# EAGLE board MeadowF7MicroDebug_REVB (EAGLE 9.2.2), part 1 of 2
uMeadow eval Kit.
DATE: 09/16/2018; ENGINEER: S.JOHNSON; PART_NUMBER: uMeadow; REV: A
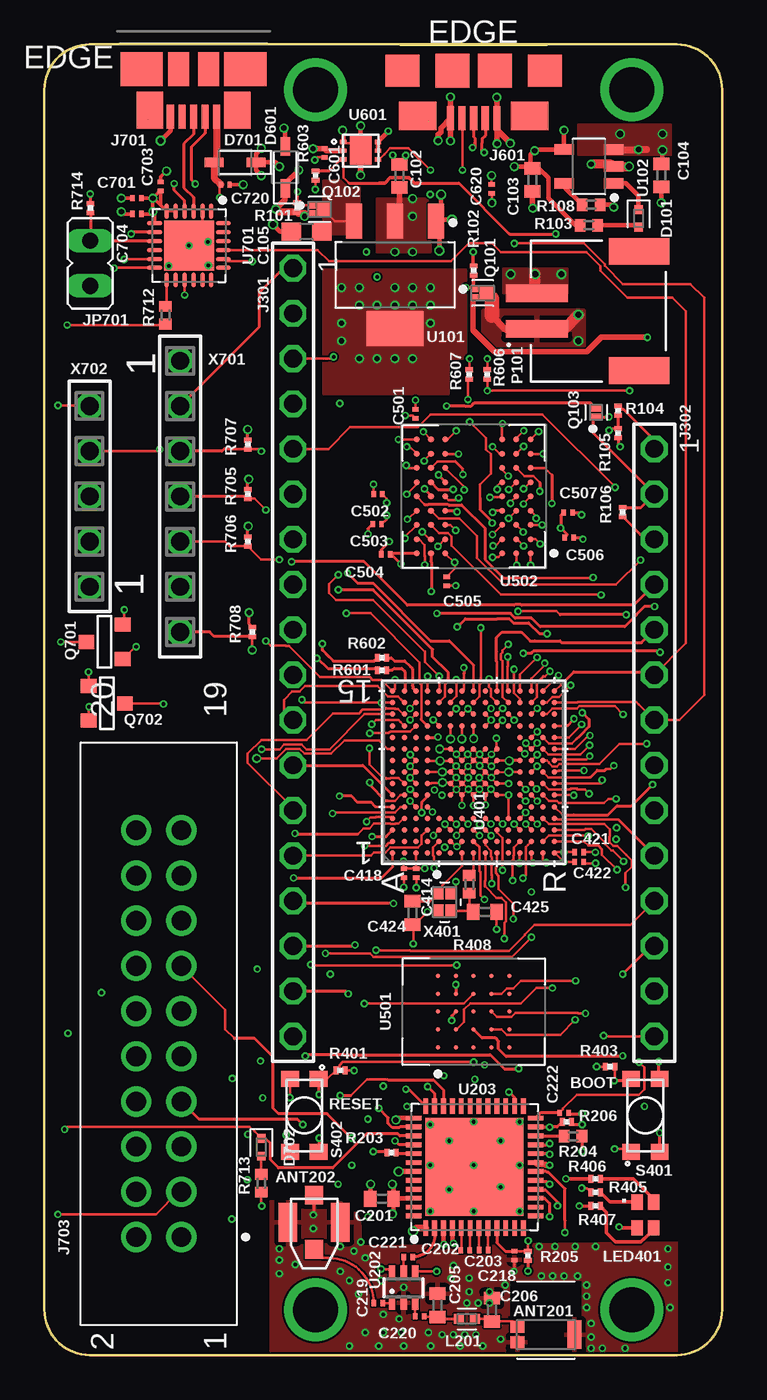
[diagram p0: board, top side]
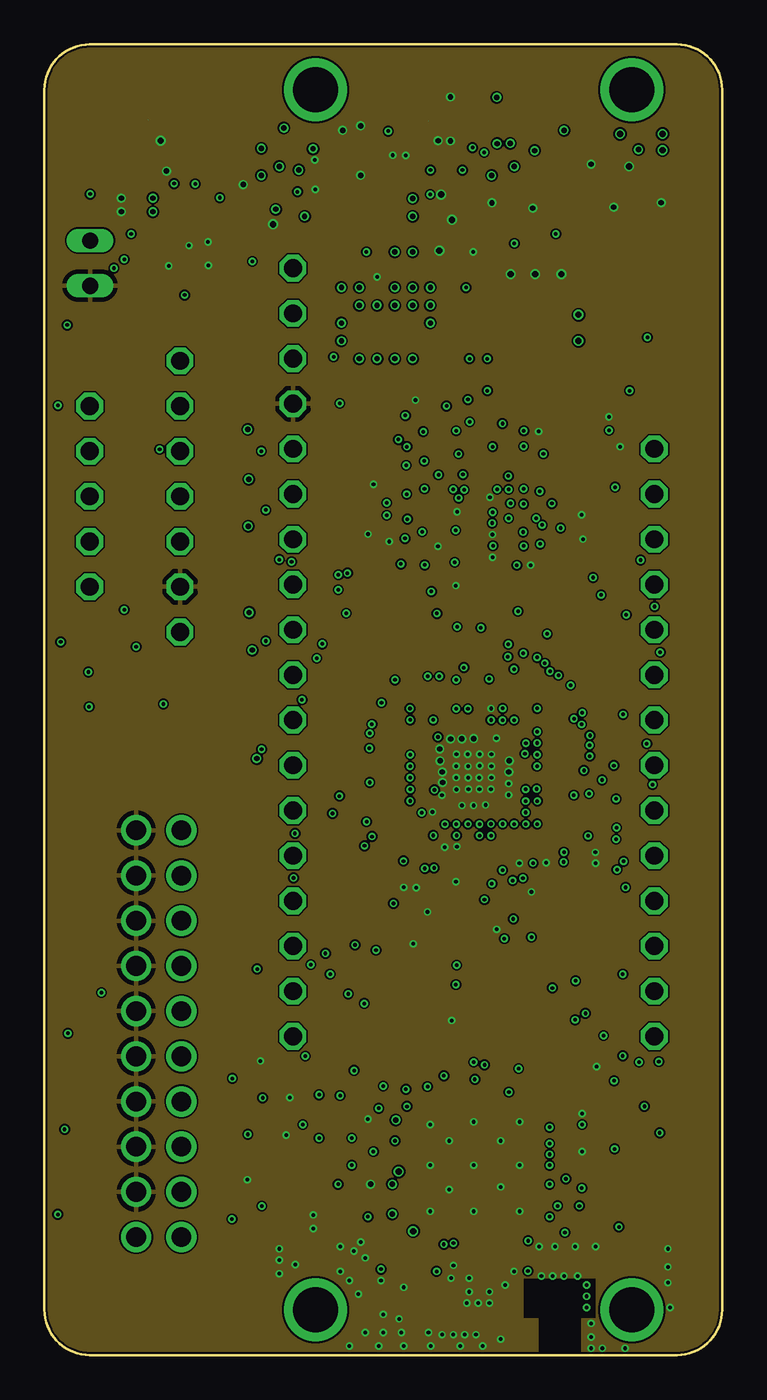
[diagram p1: board, inner layer Route2]
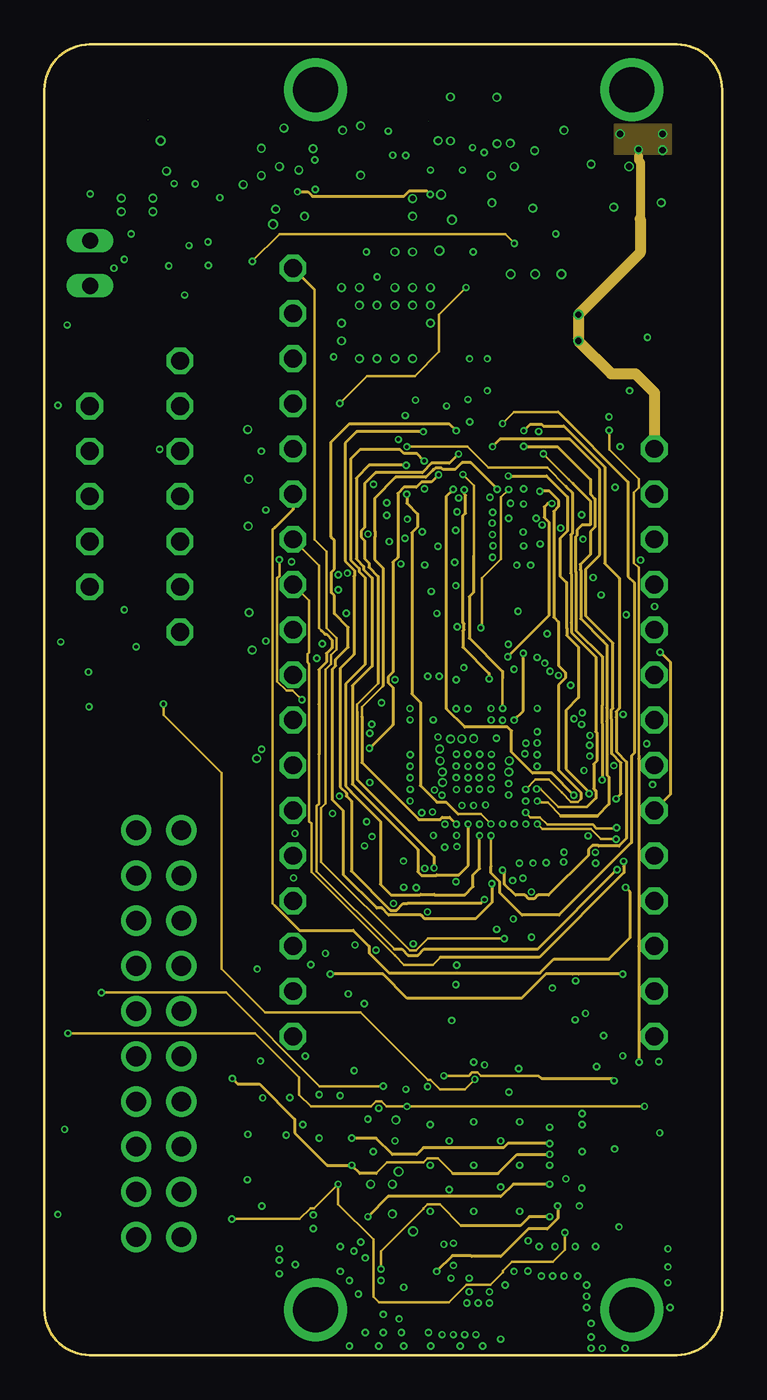
[diagram p2: board, inner layer Route3]
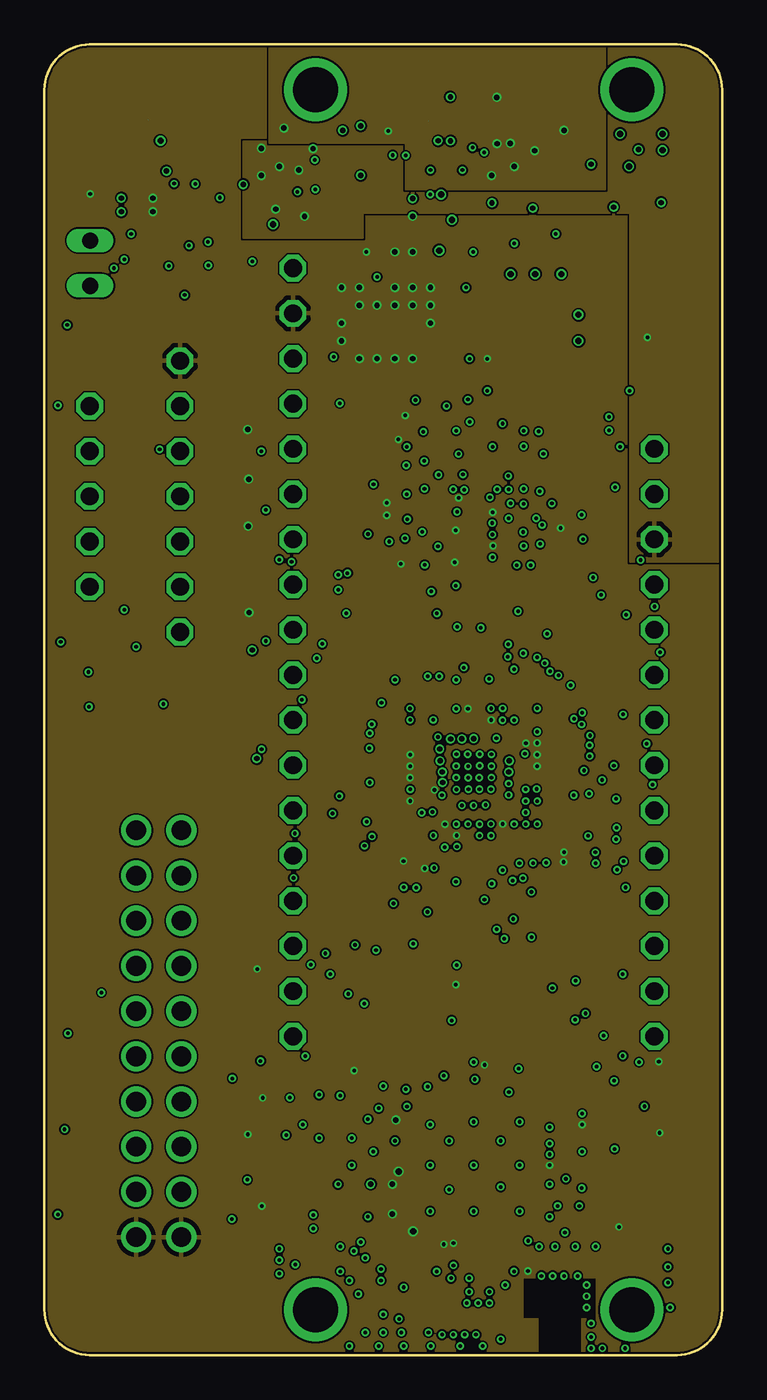
[diagram p3: board, inner layer Route14]
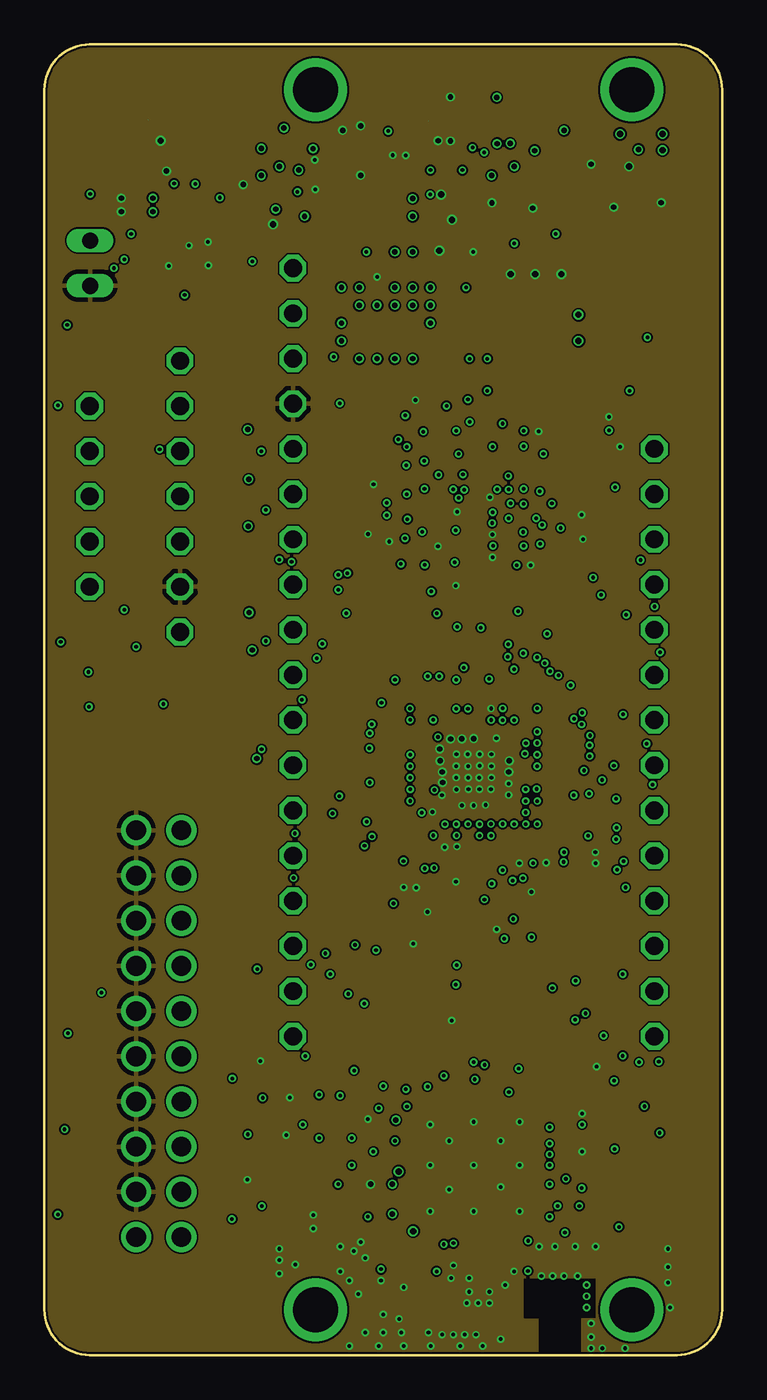
[diagram p4: board, inner layer Route15]
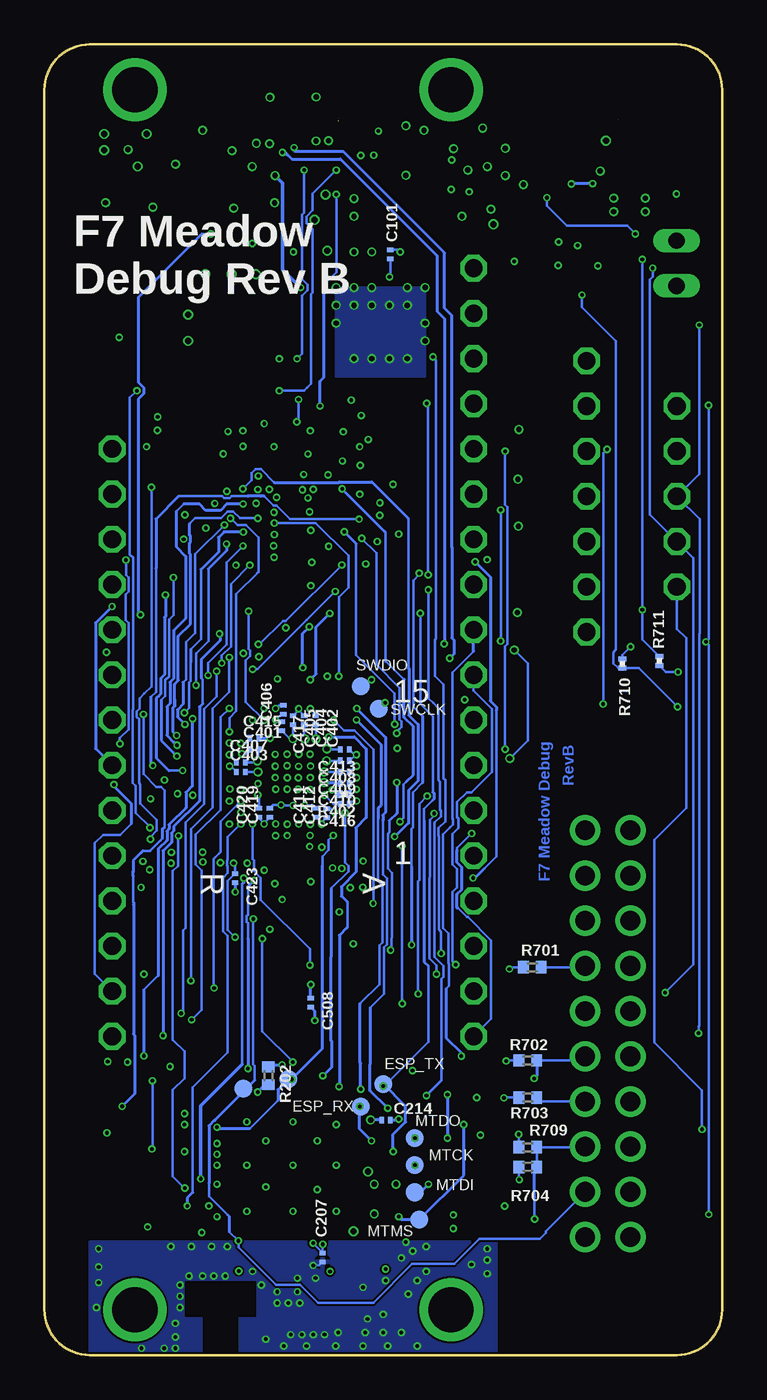
[diagram p5: board, bottom side, seen from below]

Size 38.1 x 73.66 mm. Coordinates in mm from the lower left corner, seen from the top.
Outline: 0,71.12 0,2.54 arc90 2.54,0 35.56,0 arc90 38.1,2.54 38.1,71.12 arc90 35.56,73.66 2.54,73.66 arc90 0,71.12
Copper layers (1*2+3*14+15*16): Top 0.035mm / dielectric 0.15mm / Route2 0.035mm / dielectric 0.15mm / Route3 0.035mm / dielectric 0.3mm / Route14 0.035mm / dielectric 0.15mm / Route15 0.035mm / dielectric 0.15mm / Bottom 0.035mm
Design rules "default *": minimum track width 5mil, minimum drill 0.2mm, track to track 0.1mm, track to pad 0.1mm, pad to pad 4mil, via to via 4mil, smd to smd 0mil, copper to edge 0.1mm, drill to drill 6mil, minimum pad ring 0.1mm, minimum via ring 4mil, stop-mask expansion 1mil, vias tented up to drill 20mil, thermal gap 10mil
Net classes: 1 USB: width 0.165 mm, drill 0.102 mm, clearance 0.254 mm; 2 MEM_ADDR_CNT: width 0.102 mm, drill 0.102 mm; 3 MEM_DATA: width 0.102 mm; 4 5V: width 0.1 mm; 5 50ohm: width 0.1 mm; 6 POWER: width 0.1 mm, drill 0.203 mm; 7 CLK: width 0.1 mm, drill 0.203 mm; 8 ANT: clearance 0.3 mm

## Footprints (pad centres in the part's own frame; a part is rotated, then mirrored left to right if it is on the bottom)
W3008 = smd 0.8 x 0.65: 1 1.6,-0.425; 2 1.6,0.425 | smd 0.8 x 1.6: 3 -1.6,0
A-1JB = smd 2.2 x 1.05: GND 0,1.475; GND2 0,-1.475 | smd 1.05 x 1: GND1 -1.525,0; SIG 1.525,0
C0201 = smd 0.25 x 0.35: 1 -0.25,0; 2 0.25,0
C0402 = smd 0.7 x 0.9: 1 -0.65,0; 2 0.65,0
C0603 = smd 1.1 x 1: 1 -0.85,0; 2 0.85,0
LEDC1005X50 = smd 0.5 x 0.5: 1 -0.5,0; 2 0.5,0
SOD2512X117 = smd 1.054 x 0.53: 1 -1.181,0; 2 1.181,0
TSW-118-XX-G-S = drill 1 pad 1.5 octagon: 1 21.59,0; 2 19.05,0; 3 16.51,0; 4 13.97,0; 5 11.43,0; 6 8.89,0; 7 6.35,0; 8 3.81,0; 9 1.27,0; 10 -1.27,0; 11 -3.81,0; 12 -6.35,0; 13 -8.89,0; 14 -11.43,0; 15 -13.97,0; 16 -16.51,0; 17 -19.05,0; 18 -21.59,0
TSW-114-XX-G-S = drill 1 pad 1.5 octagon: 1 16.51,0; 2 13.97,0; 3 11.43,0; 4 8.89,0; 5 6.35,0; 6 3.81,0; 7 1.27,0; 8 -1.27,0; 9 -3.81,0; 10 -6.35,0; 11 -8.89,0; 12 -11.43,0; 13 -13.97,0; 14 -16.51,0
USB_OTG = smd 0.4 x 1.35: 1 -1.3,2.675; 2 -0.65,2.675; 3 0,2.675; 4 0.65,2.675; 5 1.3,2.675 | smd 2.1 x 1.6: SHD1 3.15,2.55; SHD2 -3.15,2.55 | smd 1.9 x 1.9: SHD3 1.2,0; SHD4 -1.2,0 | smd 1.9 x 1.8: SHD5 -4,0; SHD6 4,0
USB_473461001 = smd 0.4 x 1.35: 1 -1.3,2.675; 2 -0.65,2.675; 3 0,2.675; 4 0.65,2.675; 5 1.3,2.675 | smd 1.5 x 2.1: SHD1 2.462,2.3; SHD2 -2.462,2.3 | smd 1.175 x 1.9: SHD3 0.838,0; SHD4 -0.838,0 | smd 2.375 x 1.9: SHD5 -2.913,0; SHD6 2.913,0
HDRV20W64P254_2X10_3276X876X838B = drill 1.105 pad 1.705: 1 0,0; 2 0,2.54; 3 2.54,0; 4 2.54,2.54; 5 5.08,0; 6 5.08,2.54; 7 7.62,0; 8 7.62,2.54; 9 10.16,0; 10 10.16,2.54; 11 12.7,0; 12 12.7,2.54; 13 15.24,0; 14 15.24,2.54; 15 17.78,0; 16 17.78,2.54; 17 20.32,0; 18 20.32,2.54; 19 22.86,0; 20 22.86,2.54
JP1 = drill 0.914 long: 1 0,-1.27; 2 0,1.27
L0402 = smd 0.556 x 0.559: 1 -0.452,0; 2 0.452,0
LTST-C19HE1WT = smd 0.65 x 0.85: 1 -0.475,0.725; 2 0.475,0.725; 3 0.475,-0.725; 4 -0.475,-0.725
MTH_100_140MIL = drill 2.54 pad 3.556: P$1 0,0
JST_S2B-PH-SM4-TB(LF)(SN) = smd 1 x 3.5: 1 1,0; 2 -1,0 | smd 1.5 x 3.4: P1 3.35,5.75; P2 -3.35,5.75
DFN120X80X50-3 = smd 0.36 x 0.35: 1 -0.42,0.225; 2 -0.42,-0.225 | smd 0.76 x 0.772: 3 0.195,0
DFN80X60X40-3 = smd 0.35 x 0.3: 1 -0.245,0.175; 2 -0.245,-0.175 | smd 0.35 x 0.65: 3 0.22,0
SOT-23 = smd 0.787 x 0.889: 1 0.025,-1.016; 2 -0.94,1.016; 3 0.991,1.016
R0201 = smd 0.28 x 0.43: 1 -0.255,0; 2 0.255,0
R0402 = smd 0.6 x 0.7: 1 -0.5,0; 2 0.5,0
KMR211NG = smd 0.9 x 1: 1 -2.05,0.8; 2 2.05,0.8; 3 2.05,-0.8; 4 -2.05,-0.8
TP_SMT_40MIL = smd 1.016 x 1.016: 1 0,0
SOT230P700X180-4 = smd 1.965 x 0.889: 1 -3.023,2.3; 2 -3.023,0; 3 -3.023,-2.3 | smd 1.965 x 3.189: 4 3.023,0
SOT95P270X145-5 = smd 1.1 x 0.6: 1 -1.4,0.95; 2 -1.4,0; 3 -1.4,-0.95; 4 1.4,-0.95; 5 1.4,0.95
SC70-6L = smd 0.35 x 0.8: 1 -0.65,-0.85; 2 0,-0.85; 3 0.65,-0.85; 4 0.65,0.85; 5 0,0.85; 6 -0.65,0.85
QFN50P700X700X104-49T550 = smd 0.866 x 0.27: 1 -3.432,2.75; 2 -3.432,2.25; 3 -3.432,1.75; 4 -3.432,1.25; 5 -3.432,0.75; 6 -3.432,0.25; 7 -3.432,-0.25; 8 -3.432,-0.75; 9 -3.432,-1.25; 10 -3.432,-1.75; 11 -3.432,-2.25; 12 -3.432,-2.75; 25 3.432,-2.75; 26 3.432,-2.25; 27 3.432,-1.75; 28 3.432,-1.25; 29 3.432,-0.75; 30 3.432,-0.25; 31 3.432,0.25; 32 3.432,0.75; 33 3.432,1.25; 34 3.432,1.75; 35 3.432,2.25; 36 3.432,2.75 | smd 0.27 x 0.866: 13 -2.75,-3.432; 14 -2.25,-3.432; 15 -1.75,-3.432; 16 -1.25,-3.432; 17 -0.75,-3.432; 18 -0.25,-3.432; 19 0.25,-3.432; 20 0.75,-3.432; 21 1.25,-3.432; 22 1.75,-3.432; 23 2.25,-3.432; 24 2.75,-3.432; 37 2.75,3.432; 38 2.25,3.432; 39 1.75,3.432; 40 1.25,3.432; 41 0.75,3.432; 42 0.25,3.432; 43 -0.25,3.432; 44 -0.75,3.432; 45 -1.25,3.432; 46 -1.75,3.432; 47 -2.25,3.432; 48 -2.75,3.432 | smd 5.5 x 5.5: 49 0,0
UFBGA-176 = smd 0.3 x 0.3: A1 -4.55,4.55; A2 -3.9,4.55; A3 -3.25,4.55; A4 -2.6,4.55; A5 -1.95,4.55; A6 -1.3,4.55; A7 -0.65,4.55; A8 0,4.55; A9 0.65,4.55; A10 1.3,4.55; A11 1.95,4.55; A12 2.6,4.55; A13 3.25,4.55; A14 3.9,4.55; A15 4.55,4.55; B1 -4.55,3.9; B2 -3.9,3.9; B3 -3.25,3.9; B4 -2.6,3.9; B5 -1.95,3.9; B6 -1.3,3.9; B7 -0.65,3.9; B8 0,3.9; B9 0.65,3.9; B10 1.3,3.9; B11 1.95,3.9; B12 2.6,3.9; B13 3.25,3.9; B14 3.9,3.9; B15 4.55,3.9; C1 -4.55,3.25; C2 -3.9,3.25; C3 -3.25,3.25; C4 -2.6,3.25; C5 -1.95,3.25; C6 -1.3,3.25; C7 -0.65,3.25; C8 0,3.25; C9 0.65,3.25; C10 1.3,3.25; C11 1.95,3.25; C12 2.6,3.25; C13 3.25,3.25; C14 3.9,3.25; C15 4.55,3.25; D1 -4.55,2.6; D2 -3.9,2.6; D3 -3.25,2.6; D4 -2.6,2.6; D5 -1.95,2.6; D6 -1.3,2.6; D7 -0.65,2.6; D8 0,2.6; D9 0.65,2.6; D10 1.3,2.6; D11 1.95,2.6; D12 2.6,2.6; D13 3.25,2.6; D14 3.9,2.6; D15 4.55,2.6; E1 -4.55,1.95; E2 -3.9,1.95; E3 -3.25,1.95; E4 -2.6,1.95; E12 2.6,1.95; E13 3.25,1.95; E14 3.9,1.95; E15 4.55,1.95; F1 -4.55,1.3; F2 -3.9,1.3; F3 -3.25,1.3; F4 -2.6,1.3; F6 -1.3,1.3; F7 -0.65,1.3; F8 0,1.3; F9 0.65,1.3; F10 1.3,1.3; F12 2.6,1.3; F13 3.25,1.3; F14 3.9,1.3; F15 4.55,1.3; G1 -4.55,0.65; G2 -3.9,0.65; G3 -3.25,0.65; G4 -2.6,0.65; G6 -1.3,0.65; G7 -0.65,0.65; G8 0,0.65; G9 0.65,0.65; G10 1.3,0.65; G12 2.6,0.65; G13 3.25,0.65; G14 3.9,0.65; G15 4.55,0.65; H1 -4.55,0; H2 -3.9,0; H3 -3.25,0; H4 -2.6,0; H6 -1.3,0; H7 -0.65,0; H8 0,0; H9 0.65,0; H10 1.3,0; H12 2.6,0; H13 3.25,0; H14 3.9,0; H15 4.55,0; J1 -4.55,-0.65; J2 -3.9,-0.65; J3 -3.25,-0.65; J4 -2.6,-0.65; J6 -1.3,-0.65; J7 -0.65,-0.65; J8 0,-0.65; J9 0.65,-0.65; J10 1.3,-0.65; J12 2.6,-0.65; J13 3.25,-0.65; J14 3.9,-0.65; J15 4.55,-0.65; K1 -4.55,-1.3; K2 -3.9,-1.3; K3 -3.25,-1.3; K4 -2.6,-1.3; K6 -1.3,-1.3; K7 -0.65,-1.3; K8 0,-1.3; K9 0.65,-1.3; K10 1.3,-1.3; K12 2.6,-1.3; K13 3.25,-1.3; K14 3.9,-1.3; K15 4.55,-1.3; L1 -4.55,-1.95; L2 -3.9,-1.95; L3 -3.25,-1.95; L4 -2.6,-1.95; L12 2.6,-1.95; L13 3.25,-1.95; L14 3.9,-1.95; L15 4.55,-1.95; M1 -4.55,-2.6; M2 -3.9,-2.6; M3 -3.25,-2.6; M4 -2.6,-2.6; M5 -1.95,-2.6; M6 -1.3,-2.6; M7 -0.65,-2.6; M8 0,-2.6; M9 0.65,-2.6; M10 1.3,-2.6; M11 1.95,-2.6; M12 2.6,-2.6; M13 3.25,-2.6; M14 3.9,-2.6; M15 4.55,-2.6; N1 -4.55,-3.25; N2 -3.9,-3.25; N3 -3.25,-3.25; N4 -2.6,-3.25; N5 -1.95,-3.25; N6 -1.3,-3.25; N7 -0.65,-3.25; N8 0,-3.25; N9 0.65,-3.25; N10 1.3,-3.25; N11 1.95,-3.25; N12 2.6,-3.25; N13 3.25,-3.25; N14 3.9,-3.25; N15 4.55,-3.25; P1 -4.55,-3.9; P2 -3.9,-3.9; P3 -3.25,-3.9; P4 -2.6,-3.9; P5 -1.95,-3.9; P6 -1.3,-3.9; P7 -0.65,-3.9; P8 0,-3.9; P9 0.65,-3.9; P10 1.3,-3.9; P11 1.95,-3.9; P12 2.6,-3.9; P13 3.25,-3.9; P14 3.9,-3.9; P15 4.55,-3.9; R1 -4.55,-4.55; R2 -3.9,-4.55; R3 -3.25,-4.55; R4 -2.6,-4.55; R5 -1.95,-4.55; R6 -1.3,-4.55; R7 -0.65,-4.55; R8 0,-4.55; R9 0.65,-4.55; R10 1.3,-4.55; R11 1.95,-4.55; R12 2.6,-4.55; R13 3.25,-4.55; R14 3.9,-4.55; R15 4.55,-4.55
BGA25C100P5X5_800X600X120 = smd 0.25 x 0.25: A1 -2,2; A2 -1,2; A3 0,2; A4 1,2; A5 2,2; B1 -2,1; B2 -1,1; B3 0,1; B4 1,1; B5 2,1; C1 -2,0; C2 -1,0; C3 0,0; C4 1,0; C5 2,0; D1 -2,-1; D2 -1,-1; D3 0,-1; D4 1,-1; D5 2,-1; E1 -2,-2; E2 -1,-2; E3 0,-2; E4 1,-2; E5 2,-2
BGA81C80P9X9_800X800X120 = smd 0.35 x 0.35: A1 -3.2,3.2; A2 -2.4,3.2; A3 -1.6,3.2; A7 1.6,3.2; A8 2.4,3.2; A9 3.2,3.2; B1 -3.2,2.4; B2 -2.4,2.4; B3 -1.6,2.4; B7 1.6,2.4; B8 2.4,2.4; B9 3.2,2.4; C1 -3.2,1.6; C2 -2.4,1.6; C3 -1.6,1.6; C7 1.6,1.6; C8 2.4,1.6; C9 3.2,1.6; D1 -3.2,0.8; D2 -2.4,0.8; D3 -1.6,0.8; D7 1.6,0.8; D8 2.4,0.8; D9 3.2,0.8; E1 -3.2,0; E2 -2.4,0; E3 -1.6,0; E7 1.6,0; E8 2.4,0; E9 3.2,0; F1 -3.2,-0.8; F2 -2.4,-0.8; F3 -1.6,-0.8; F7 1.6,-0.8; F8 2.4,-0.8; F9 3.2,-0.8; G1 -3.2,-1.6; G2 -2.4,-1.6; G3 -1.6,-1.6; G7 1.6,-1.6; G8 2.4,-1.6; G9 3.2,-1.6; H1 -3.2,-2.4; H2 -2.4,-2.4; H3 -1.6,-2.4; H7 1.6,-2.4; H8 2.4,-2.4; H9 3.2,-2.4; J1 -3.2,-3.2; J2 -2.4,-3.2; J3 -1.6,-3.2; J7 1.6,-3.2; J8 2.4,-3.2; J9 3.2,-3.2
U-DFN2018-6 = smd 0.35 x 0.25: 1 -0.975,0.5; 2 -0.975,0; 3 -0.975,-0.5; 4 0.975,-0.5; 5 0.975,0; 6 0.975,0.5 | smd 1.2 x 1.6: TAB 0,0
QFN50P400X400X80-25T280 = smd 0.86 x 0.264: 1 -1.935,1.25; 2 -1.935,0.75; 3 -1.935,0.25; 4 -1.935,-0.25; 5 -1.935,-0.75; 6 -1.935,-1.25; 13 1.935,-1.25; 14 1.935,-0.75; 15 1.935,-0.25; 16 1.935,0.25; 17 1.935,0.75; 18 1.935,1.25 | smd 0.264 x 0.86: 7 -1.25,-1.935; 8 -0.75,-1.935; 9 -0.25,-1.935; 10 0.25,-1.935; 11 0.75,-1.935; 12 1.25,-1.935; 19 1.25,1.935; 20 0.75,1.935; 21 0.25,1.935; 22 -0.25,1.935; 23 -0.75,1.935; 24 -1.25,1.935 | smd 2.8 x 2.8: 25 0,0
OSCCC160X120X40 = smd 0.73 x 0.58: 1 -0.5,-0.35; 2 0.5,-0.35; 3 0.5,0.35; 4 -0.5,0.35
SSW-107-02-G-S = drill 1 pad 1.5 octagon: 1 -7.62,0; 2 -5.08,0; 3 -2.54,0; 4 0,0; 5 2.54,0; 6 5.08,0; 7 7.62,0
SSW-105-02-G-S = drill 1 pad 1.5 octagon: 1 -5.08,0; 2 -2.54,0; 3 0,0; 4 2.54,0; 5 5.08,0

## Placement (x,y rotation side)
ANT201  w3008  [W3008]  28.19,1.14 180 top
ANT202  A-1JB  [A-1JB]  15.16,7.47 270 top
C101  0.1uF  [C0201]  18.66,61.87 270 bottom
C102  10uF  [C0402]  19.96,66.27 90 top
C103  4.7uF  [C0402]  27.43,66.04 270 top
C104  4.7uF  [C0402]  34.67,66.29 270 top
C105  10uF  [C0603]  14.73,63.14 180 top
C201  10uF  [C0402]  18.97,8.79 180 top
C202  0.1uF  [C0201]  23.65,5.88 0 top
C203  0.1uF  [C0201]  24.68,5.9 0 top
C205  6pF  [C0402]  22.1,2.79 90 top
C206  6.2pF  [C0402]  25.15,2.54 90 top
C207  0.1uF  [C0201]  22.46,5.49 270 bottom
C214  0.1uF  [C0201]  18.9,13.21 0 bottom
C218  0.1uF  [C0201]  26.42,5.59 270 top
C219  100pF  [C0201]  18.77,2.92 0 top
C220  100pF  [C0201]  21.11,2.18 180 top
C221  100pF  [C0201]  20.45,5.51 0 top
C222  0.1uF  [C0201]  29.21,13.61 0 top
C401  2.2uF  [C0201]  26.29,34.04 0 bottom
C402  2.2uF  [C0201]  22.86,35.69 270 bottom
C403  0.1uF  [C0201]  27.05,32.77 0 bottom
C404  1uF  [C0201]  23.49,35.69 270 bottom
C405  0.1uF  [C0201]  24.12,35.68 270 bottom
C406  0.1uF  [C0201]  24.67,36.27 90 bottom
C407  0.1uF  [C0201]  27.05,33.31 0 bottom
C408  0.1uF  [C0201]  21.21,33.4 180 bottom
C409  0.1uF  [C0201]  21.21,32.77 180 bottom
C410  0.1uF  [C0201]  21.21,32.13 180 bottom
C411  0.1uF  [C0201]  22.83,30.49 90 bottom
C412  0.1uF  [C0201]  22.23,30.46 90 bottom
C413  0.1uF  [C0201]  21.21,34.04 180 bottom
C414  0.1uF  [C0201]  20.9,27.09 270 top
C415  0.1uF  [C0201]  26.29,34.67 0 bottom
C416  0.1uF  [C0201]  21.22,30.97 180 bottom
C417  0.1uF  [C0201]  24.76,35.34 270 bottom
C418  0.1uF  [C0201]  20.21,27.09 270 top
C419  1uF  [C0201]  25.43,30.49 90 bottom
C420  0.1uF  [C0201]  26.04,30.48 90 bottom
C421  0.1uF  [C0201]  30.05,28.26 0 top
C422  1uF  [C0201]  30.05,27.72 0 top
C423  0.1uF  [C0201]  27.38,26.79 270 bottom
C424  8pF  [C0402]  20.7,24.85 270 top
C425  8pF  [C0402]  24.77,24.89 0 top
C501  0.1uF  [C0201]  20.86,52.91 90 top
C502  0.1uF  [C0201]  18.75,48.39 180 top
C503  0.1uF  [C0201]  18.7,46.7 180 top
C504  1uF  [C0201]  19.19,45 180 top
C505  0.1uF  [C0201]  22.62,43.49 270 top
C506  1uF  [C0201]  29.49,45.94 0 top
C507  0.1uF  [C0201]  29.44,47.35 0 top
C508  0.1uF  [C0201]  23.13,19.8 270 bottom
C601  0.1uF  [C0201]  15.75,67.56 270 top
C620  4.7uF  [C0201]  25.15,65.53 270 top
C701  0.1uF  [C0201]  5.21,65.02 180 top
C703  0.1uF  [C0201]  6.53,65.68 90 top
C704  1uF  [C0201]  5.21,64.14 180 top
C720  4.7uF  [C0201]  10.16,65.79 0 top
D101  QBLP595-O  [LEDC1005X50]  33.4,63.88 270 top
D601  BAT60JFILM  [SOD2512X117]  13.53,66.75 90 top
D701  BAT60JFILM  [SOD2512X117]  10.72,67.03 180 top
D702  QBLP595-O  [LEDC1005X50]  12.19,11.68 270 top
DRILEGEND  [DRILEGEND]  -105.34,-61.67 0 top  (outside the outline)
J301  TSW-118-07-G-S  [TSW-118-XX-G-S]  13.97,39.5 90 top
J302  TSW-114-07-G-S  [TSW-114-XX-G-S]  34.29,34.42 90 top
J601  USB_OTG_ZX62-AB-5PA  [USB_OTG]  24.13,72.19 180 top
J701  uUSB-B  [USB_473461001]  8.38,72.26 180 top
J703  02X20  [HDRV20W64P254_2X10_3276X876X838B]  7.7,6.63 90 top
JP701  [JP1]  2.57,61.37 180 top
L201  1.5nH  [L0402]  23.75,2.03 180 top
LED401  LTST-C19HE1WT  [LTST-C19HE1WT]  33.78,7.87 0 top
MTH1  100MIL_140MIL  [MTH_100_140MIL]  15.24,2.54 0 top
MTH2  100MIL_140MIL  [MTH_100_140MIL]  33.02,2.54 0 top
MTH3  100MIL_140MIL  [MTH_100_140MIL]  15.24,71.12 0 top
MTH4  100MIL_140MIL  [MTH_100_140MIL]  33.02,71.12 0 top
P101  S2B-PH-SM4-TB(LF)(SN)  [JST_S2B-PH-SM4-TB(LF)(SN)]  27.69,58.67 270 top
Q101  SSM3J46CTB  [DFN120X80X50-3]  24.64,59.69 0 top
Q102  SSM3J46CTB  [DFN120X80X50-3]  15.47,64.39 0 top
Q103  RV1C002UNT2CL_NCH  [DFN80X60X40-3]  31.01,52.98 90 top
Q701  MMSS8050-H-TP  [SOT-23]  3.38,40.11 270 top
Q702  MMSS8050-H-TP  [SOT-23]  3.51,36.6 90 top
R101  10K  [R0201]  14.2,64.5 90 top
R102  10K  [R0201]  24.13,60.96 270 top
R103  1K  [R0402]  30.61,63.5 0 top
R104  499K  [R0201]  32.26,53.09 90 top
R105  499K  [R0201]  32.26,51.82 90 top
R106  10K  [R0201]  32.51,47.37 90 top
R108  4.7K  [R0402]  30.73,64.64 0 top
R202  00  [R0402]  25.5,15.7 270 bottom
R203  499  [R0201]  19.51,11.38 180 top
R204  20K  [R0201]  29.36,13.11 180 top
R205  10K  [R0201]  27.18,5.59 270 top
R206  10k  [R0402]  29.72,12.29 0 top
R401  10K  [R0201]  16.64,16 0 top
R402  10K  [R0201]  21.22,31.52 180 bottom
R403  10K  [R0201]  31.8,16.21 0 top
R405  620  [R0201]  30.99,9.14 0 top
R406  300  [R0201]  30.99,9.91 0 top
R407  300  [R0201]  30.99,8.38 0 top
R408  00  [R0402]  23.88,26.45 90 top
R601  0R  [R0201]  18.98,38.49 180 top
R602  0R  [R0201]  18.97,39.18 180 top
R603  10K  [R0201]  15.24,66.29 90 top
R606  47K  [R0201]  24.89,55.12 90 top
R607  0R  [R0201]  23.88,55.12 90 top
R701  10k  [R0402]  10.67,21.79 0 bottom
R702  10k  [R0402]  10.92,16.56 180 bottom
R703  10k  [R0402]  10.92,14.48 0 bottom
R704  10k  [R0402]  10.92,10.57 180 bottom
R705  10K  [R0201]  11.43,48.39 90 top
R706  10K  [R0201]  11.43,45.72 90 top
R707  10K  [R0201]  11.43,51.18 90 top
R708  10K  [R0201]  11.68,40.64 90 top
R709  10k  [R0402]  10.92,11.68 0 bottom
R710  20K  [R0201]  5.61,38.86 270 bottom
R711  20K  [R0201]  3.53,39.01 90 bottom
R712  00  [R0402]  6.81,58.45 90 top
R713  1K  [R0402]  12.19,9.65 90 top
R714  10K  [R0201]  2.59,64.47 90 top
S401  SPST_SW_KMR211NG_LFS  [KMR211NG]  33.78,13.46 90 top
S402  SPST_SW_KMR211NG_LFS  [KMR211NG]  14.6,13.46 270 top
TP201  TP_SMT_40MIL  [TP_SMT_40MIL]  17.27,10.67 0 bottom
TP202  TP_SMT_40MIL  [TP_SMT_40MIL]  24.38,15.49 0 bottom
TP203  TP_SMT_40MIL  [TP_SMT_40MIL]  17.27,9.14 0 bottom
TP204  TP_SMT_40MIL  [TP_SMT_40MIL]  17.27,12.19 0 bottom
TP205  TP_SMT_40MIL  [TP_SMT_40MIL]  17.02,7.62 0 bottom
TP206  TP_SMT_40MIL  [TP_SMT_40MIL]  26.92,14.99 0 bottom
TP207  TP_SMT_40MIL  [TP_SMT_40MIL]  20.32,13.97 0 bottom
TP208  TP_SMT_40MIL  [TP_SMT_40MIL]  19.05,15.24 0 bottom
TP401  TP_SMT_40MIL  [TP_SMT_40MIL]  19.3,36.32 0 bottom
TP402  TP_SMT_40MIL  [TP_SMT_40MIL]  20.32,37.59 0 bottom
U101  LM1117MPX-3.3  [SOT230P700X180-4]  19.71,60.71 270 top
U102  MCP7381-2-0T  [SOT95P270X145-5]  30.61,66.8 180 top
U202  SKYA21001  [SC70-6L]  20.19,3.78 0 top
U203  ESP32-PICO-D4  [QFN50P700X700X104-49T550]  24.18,10.57 90 top
U401  STM32F777  [UFBGA-176]  24.13,32.77 90 top
U501  32MB  [BGA25C100P5X5_800X600X120]  24.13,19.3 90 top
U502  32MB  [BGA81C80P9X9_800X800X120]  24.13,48.26 180 top
U601  AP2151  [U-DFN2018-6]  17.78,67.69 0 top
U701  CP2105  [QFN50P400X400X80-25T280]  8.13,62.36 270 top
X401  ABM12W-25  [OSCCC160X120X40]  22.5,25.46 270 top
X701  SSW-107-02-G-S  [SSW-107-02-G-S]  7.62,48.26 270 top
X702  SSW-105-02-G-S  [SSW-105-02-G-S]  2.54,48.26 90 top

## Library data of the parts
ANT201 = SLJ_wireless; MANUFACTURER: PulseLarsen; PART_NUMBER: W3008
ANT202 = SLJ_wireless; MANUFACTURER: amphenol RF; PART_NUMBER: A-1JB
C101 = eagle-ltspice; FOOTPRINT: 0201; MANUFACTURER: Murata Electronica; PART_NUMBER: GRM033C71A104KE14D; SPICEMODEL: NONE; SPICEPREFIX: C; VOLTAGE: 10V
C102 C201 = rcl; MANUFACTURER: MURATA; PACKAGE: 0402; PART_NUMBER: GRM155R60J106ME15D; SPICEPREFIX: C
C103 C104 = rcl; MANUFACTURER: MURATA; PACKAGE: 0402; PART_NUMBER: GRM155R60J475ME87D; SPICEPREFIX: C
C105 = rcl; FOOTPRINT: 0603; MANUFACTURER: Murata Electronics North America; PART_NUMBER: GRM188R61A106ME69D; SPICEPREFIX: C; VOLTAGE: 10V
C202 C203 = eagle-ltspice; DNI: DNI; FOOTPRINT: 0201; MANUFACTURER: Murata Electronica; PART_NUMBER: GRM033R61A104ME15D; SPICEMODEL: NONE; SPICEPREFIX: C; VOLTAGE: 10V
C205 = eagle-ltspice; FOOTPRINT: 0402; MANUFACTURER: Murata Electronica; PART_NUMBER: GJM1555C1H6R0BB01D; SPICEMODEL: NONE; SPICEPREFIX: C; VOLTAGE: 50V
C206 = eagle-ltspice; FOOTPRINT: 0402; MANUFACTURER: Murata Electronica; PART_NUMBER: GRM1555C1H6R2BA01D; SPICEMODEL: NONE; SPICEPREFIX: C; VOLTAGE: 50V
C207 C214 C218 C222 C403 C405-C418 C420 C421 C423 C501-C503 C505 C507 C508 C601 C701 C703 = eagle-ltspice; FOOTPRINT: 0201; MANUFACTURER: Murata Electronica; PART_NUMBER: GRM033R61A104ME15D; SPICEMODEL: NONE; SPICEPREFIX: C; VOLTAGE: 10V
C219 C220 = eagle-ltspice; FOOTPRINT: 0201; MANUFACTURER: MURATA; PART_NUMBER: GRM0335C1H101JA01D; SPICEMODEL: NONE; SPICEPREFIX: C; VOLTAGE: 10V
C221 = eagle-ltspice; FOOTPRINT: 0201; MANUFACTURER: Murata; PART_NUMBER: GRM0335C1H101JA01D; SPICEMODEL: NONE; SPICEPREFIX: C; VOLTAGE: 10V
C401 C402 = eagle-ltspice; FOOTPRINT: 0201; MANUFACTURER: Murata Electronica; PART_NUMBER: GRM033R61A225KE47D; SPICEMODEL: NONE; SPICEPREFIX: C; VOLTAGE: 10V
C404 C419 C422 C504 C506 C704 = eagle-ltspice; FOOTPRINT: 0201; MANUFACTURER: Murata Electronica; PART_NUMBER: GRT033R60J105ME13D; SPICEMODEL: NONE; SPICEPREFIX: C; VOLTAGE: 6.3V
C424 C425 = eagle-ltspice; FOOTPRINT: 0402; MANUFACTURER: Murata Electronica; PART_NUMBER: GRM1555C1H8R0DA01D; SPICEMODEL: NONE; SPICEPREFIX: C; VOLTAGE: 50V
C620 C720 = eagle-ltspice; FOOTPRINT: 0201; MANUFACTURER: Murata Electronica; PART_NUMBER: GRM035R60J475ME15D; SPICEMODEL: NONE; SPICEPREFIX: C; VOLTAGE: 6.3V
D101 D702 = SLJ_Diodes; COLOR: ORANGE; MANUFACTURER: QT BRIGHTEK; PART_NUMBER: QBLP595-O
D601 D701 = SLJ_Diodes; MANUFACTURER: STMicroelectronics; PART_NUMBER: BAT60JFILM
DRILEGEND = drilegend
J301 = con-samtec; DNI: DNI; MANUFACTURER: Samtec; MF: Samtec Inc.; MPN: TSW-118-07-G-S; PART_NUMBER: TSW-118-07-G-S
J302 = con-samtec; DNI: DNI; MF: Samtec Inc.; MPN: TSW-114-07-G-S
J601 = SLJ_Connectors; MANUFACTURER: Hirose Electric Co.; PART_NUMBER: ZX62-AB-5PA(31)
J701 = SLJ_Connectors; MANUFACTURER: Molex; PART_NUMBER: 0473461001
J703 = SLJ_Connectors; MANUFACTURER: AMPHENOL FCI; PART_NUMBER: 52601-S20-4LF
JP701 = jumper
L201 = SLJ_passives; CURRENT: 300mA; FOOTPRINT: 0402; MANUFACTURER: Johanson Technology; PART_NUMBER: L-07C1N5SV6T
LED401 = SLJ_Diodes; MANUFACTURER: LITE-ON; PART_NUMBER: LTST-C19HE1WT
MTH1-MTH4 = SLJ_MECH; DNI: DNI
P101 = SLJ_Connectors; DESCRIPTION: PH Series 2 Position 2 mm Pitch Surface Mount Side Entry Shrouded Header; MANUFACTURER: JST; PACKAGE: FakePackage u; PART_NUMBER: S2B-PH-SM4-TB_LF__SN_; PRICE: None
Q101 Q102 = SLJ_TRANSISTORS; CURRENT: 2A; MANUFACTURER: Toshiba Semiconductor; PART_NUMBER: SSM3J46CTB(TPL3); VOLTAGE: 20V
Q103 = SLJ_TRANSISTORS; MANUFACTURER: Rohm Semiconductor; PART_NUMBER: RV1C002UNT2CL
Q701 Q702 = SLJ_TRANSISTORS; FOOTPRINT: SOT-23; MANUFACTURER: Micro Commercial; PART_NUMBER: MMSS8050-H-TP
R101 R106 = rcl; FOOTPRINT: 0201; MANUFACTURER: Panasonic; PART_NUMBER: RC0201FR-0710KL; SPICEPREFIX: R
R102 R205 R401-R403 R603 = rcl; FOOTPRINT: 0201; MANUFACTURER: Yageo; PART_NUMBER: RC0201FR-0710KL; SPICEPREFIX: R
R103 R713 = rcl; FOOTPRINT: 0402; MANUFACTURER: VISHAY; PART_NUMBER: MCS04020C1001FE000; SPICEPREFIX: R
R104 R105 = rcl; FOOTPRINT: 0201; MANUFACTURER: Yageo; PART_NUMBER: RC0201FR-07499KL; SPICEPREFIX: R
R108 = rcl; FOOTPRINT: 0402; MANUFACTURER: Panasonic; PART_NUMBER: ERA-2AEB472X; SPICEPREFIX: R
R202 = rcl; DNI: DNI; FOOTPRINT: 0402; MANUFACTURER: Panasonic; PART_NUMBER: ERJ-2GE0R00X; SPICEPREFIX: R
R203 = rcl; FOOTPRINT: 0201; MANUFACTURER: PANASONIC; PART_NUMBER: ERJ-1GNF4990C; SPICEPREFIX: R
R204 R710 R711 = rcl; FOOTPRINT: 0201; MANUFACTURER: YAGEO; PART_NUMBER: RC0201FR-0720KL; SPICEPREFIX: R
R206 R709 = rcl; DNI: DNI; FOOTPRINT: 0402; MANUFACTURER: Stackpole; PART_NUMBER: RMCF0402FT10K0; SPICEPREFIX: R
R405 = rcl; FOOTPRINT: 0201; MANUFACTURER: Yageo; PART_NUMBER: RC0201JR-07620RL; SPICEPREFIX: R
R406 R407 = rcl; FOOTPRINT: 0201; MANUFACTURER: Yageo; PART_NUMBER: RC0201FR-07300RL; SPICEPREFIX: R
R408 R712 = rcl; FOOTPRINT: 0402; MANUFACTURER: Panasonic; PART_NUMBER: ERJ-2GE0R00X; SPICEPREFIX: R
R601 R602 R607 = rcl; FOOTPRINT: 0201; MANUFACTURER: Panasonic; PART_NUMBER: ERJ-1GN0R00C; SPICEPREFIX: R
R606 = rcl; FOOTPRINT: 0201; MANUFACTURER: Samsung Electro-Mechanics; PART_NUMBER: RC0603F473CS; SPICEPREFIX: R
R701-R704 = rcl; FOOTPRINT: 0402; MANUFACTURER: Stackpole; PART_NUMBER: RMCF0402FT10K0; SPICEPREFIX: R
R705-R708 R714 = rcl; FOOTPRINT: 0201; MANUFACTURER: Panasonic; PART_NUMBER: ERJ-1GEF1002C; SPICEPREFIX: R
S401 S402 = SLJ_SWITCHES; MANUFACTURER: C&K; PART_NUMBER: KMR211NG LFS
TP201-TP208 TP401 TP402 = SLJ_MECH
U101 = SLJ_PMIC; MANUFACTURER: Texas Instruments; PART_NUMBER: LM1117MPX-3.3/NOPB
U102 = SLJ_PMIC; MANUFACTURER: MicroChip; PART_NUMBER: MCP73831T-2ACI/OT
U202 = SLJ_wireless; MANUFACTURER: Skyworks Solutions; PART_NUMBER: SKYA21001
U203 = SLJ_wireless; MANUFACTURER: Espressif Systems; PART_NUMBER: ESP32-PICO-D4
U401 = STM32_MCU; MANUFACTURER: STMicroelectronics; PART_NUMBER: STM32F777IIK6
U501 = SLJ_Memory; MANUFACTURER: Cypress Semiconductor; PART_NUMBER: S25FL256LAGBHV030
U502 = SLJ_Memory; MANUFACTURER: ISSI; PART_NUMBER: IS42S16160J-7BLI; VOLTAGE: 3.3V
U601 = SLJ_PMIC; MANUFACTURER: Diodes Inc; PART_NUMBER: AP2151DFMG-7
U701 = SLJ_IC; MANUFACTURER: SILICON LABS; PART_NUMBER: CP2105-F01-GM
X401 = SLJ_OSC; MANUFACTURER: Abracon LLC; PART_NUMBER: ABM12W-25.0000MHZ-6-B1U-T3
X701 = con-samtec; DNI: DNI; MF: Samtec Inc.; MPN: SSW-107-02-G-S; OC_FARNELL: unknown; OC_NEWARK: 11P9433
X702 = con-samtec; MF: Samtec Inc.; MPN: SSW-105-02-G-S; OC_FARNELL: unknown; OC_NEWARK: 11P9399

## Nets
+3V3 [POWER]: C101.1 C102.1 C201.1 C207.1 C214.1 C403.1 C404.1 C405.1 C406.1 C407.1 C408.1 C409.1 C410.1 C411.1 C412.1 C413.1 C414.1 C415.1 C416.1 C417.1 C418.1 C419.1 C420.1 C421.1 C422.1 C501.1 C502.1 C503.1 C504.1 C505.1 C506.1 C507.1 C508.1 C701.1 C703.1 C704.1 J301.2 J703.1 J703.2 LED401.4 R202.1 R204.1 R205.2 R401.2 R402.2 R606.2 R701.1 R703.1 R705.2 R706.2 R707.2 R708.2 R709.1 R713.1 R714.2 S401.3 S401.4 U101.2 U101.4 U203.1 U203.3 U203.4 U203.19 U203.37 U203.43 U203.46 U401.C1 U401.C5 U401.C7 U401.C8 U401.C9 U401.F3 U401.G3 U401.G13 U401.H13 U401.J12 U401.J13 U401.K4 U401.N8 U401.N9 U401.N10 U401.R1 U501.B4 U502.A7 U502.A9 U502.B3 U502.C7 U502.D3 U502.E7 U502.J9 U701.5 U701.6 U701.7 X701.1
+5V [5V]: C601.1 D601.1 D701.1 J302.3 Q101.2 Q102.2 R101.1 R106.1 U601.2
+VBAT [CLK]: C104.1 J302.1 P101.1 Q101.3 R104.2 U102.3
+VBUS [POWER]: C103.1 C620.1 D601.2 J601.1 Q101.1 R102.2 R103.1 U102.4 U401.E15 U601.5 U601.6
+VREF [MEM_DATA]: C423.1 J301.3 U401.N1
ADC1_IN3 [MEM_DATA]: J301.7 U401.R2
ADC1_IN7 [MEM_DATA]: J301.8 U401.R3
ADC1_IN10 [MEM_DATA]: J301.9 U401.M2
ADC1_IN11 [MEM_DATA]: J301.10 U401.M3
BLINKY: D702.1 U203.39 X702.1
CAN1_RX [MEM_DATA]: J301.17 U401.A5
CAN1_TX [MEM_DATA]: J301.18 U401.B4
DAC_OUT1 [MEM_DATA]: J301.5 U401.N4
DAC_OUT2 [MEM_DATA]: J301.6 U401.P4
DEBUG1:+VBUS_UART: C720.1 D701.2 J701.1 U701.8
DEBUG1:D_N [USB]: J701.2 U701.4
DEBUG1:D_P [USB]: J701.3 U701.3
DEBUG1:DTR: Q702.2 R710.2 U701.15
DEBUG1:ID: J701.4
DEBUG1:N$1: Q701.3 R710.1
DEBUG1:N$2: Q702.3 R711.1
DEBUG1:N$5: D702.2 R713.2
DEBUG1:RTS: Q701.2 R711.2 U701.11
DEBUG1:UART_RESET_L: JP701.1 R714.1 U701.9
DEBUG1:USB1_UART_TX_X: R712.2 U701.13
EN_3V3: J302.2 Q103.1 R106.2
ESP32:CHIP_ANT_50OHM [ANT]: C205.1 C220.1 L201.2
ESP32:EXTANT_50OHM [ANT]: ANT202.SIG C219.1
ESP32:FLASH_VDD: R202.2 U203.26
ESP32:GPIO2: R206.1 U203.22
ESP32:GPIO26: U202.6 U203.15
ESP32:GPIO27: U202.4 U203.16
ESP32:LNA_50OHM [ANT]: C221.2 U203.2
ESP32:N$3: C203.2 U203.8
ESP32:N$4: C202.1 U203.5
ESP32:N$5: C202.2 U203.6
ESP32:N$7: C203.1 U203.7
ESP32:N$8 [ANT]: ANT201.1 C206.1 L201.1
ESP32:N$9 [MEM_DATA]: U203.10
ESP32:N$10: R203.1 U203.41
ESP32:N$12 [MEM_DATA]: U203.11
ESP32:N$13: C220.2 U202.3
ESP32:N$14: C219.2 U202.1
ESP32:N$15: C221.1 U202.5
ESP32_BOOT_L: Q702.1 R204.2 TP202.1 U203.23 U401.E3 X702.4
ESP32_MTCK: J703.9 R702.1 TP201.1 U203.20
ESP32_MTDI: J703.5 R704.1 R709.2 TP203.1 U203.18
ESP32_MTDO: J703.13 R701.2 TP204.1 U203.21
ESP32_MTMS: J703.7 R703.2 TP205.1 U203.17
ESP32_RESET_L: C218.1 J703.3 Q701.1 R205.1 TP206.1 U203.9 U401.K1 X702.5
ESP32_UART5: R203.2 TP208.1 U401.D12 U701.12 X702.2
FLASH_CLK [CLK]: U401.M6 U501.B2
FLASH_CS_L [CLK]: U401.R12 U501.C2
FMC_A0 [MEM_ADDR_CNT]: U401.E2 U502.H7
FMC_A1 [MEM_ADDR_CNT]: U401.H3 U502.H8
FMC_A2 [MEM_ADDR_CNT]: U401.H2 U502.J8
FMC_A3 [MEM_ADDR_CNT]: U401.J2 U502.J7
FMC_A4 [MEM_ADDR_CNT]: U401.J3 U502.J3
FMC_A5 [MEM_ADDR_CNT]: U401.K3 U502.J2
FMC_A6 [MEM_ADDR_CNT]: U401.P6 U502.H3
FMC_A7 [MEM_ADDR_CNT]: U401.N6 U502.H2
FMC_A8 [MEM_ADDR_CNT]: U401.R7 U502.H1
FMC_A9 [MEM_ADDR_CNT]: U401.P7 U502.G3
FMC_A10 [MEM_ADDR_CNT]: U401.N7 U502.H9
FMC_A11 [MEM_ADDR_CNT]: U401.M7 U502.G2
FMC_A12 [MEM_ADDR_CNT]: U401.L15 U502.G1
FMC_A13 [MEM_ADDR_CNT]: U502.E2
FMC_A14 [MEM_ADDR_CNT]: U401.K14 U502.G7
FMC_A15 [MEM_ADDR_CNT]: U401.K13 U502.G8
FMC_CAS_L [MEM_ADDR_CNT]: U401.B7 U502.F7
FMC_CKE_L [MEM_ADDR_CNT]: U401.F4 U502.F3
FMC_CLK [MEM_ADDR_CNT]: U401.H14 U502.F2
FMC_CS_L [MEM_ADDR_CNT]: U401.G4 U502.G9
FMC_D0 [MEM_DATA]: U401.M14 U502.A8
FMC_D1 [MEM_DATA]: U401.L14 U502.B9
FMC_D2 [MEM_DATA]: U401.B12 U502.B8
FMC_D3 [MEM_DATA]: U401.C12 U502.C9
FMC_D4 [MEM_DATA]: U401.R8 U502.C8
FMC_D5 [MEM_DATA]: U401.P8 U502.D9
FMC_D6 [MEM_DATA]: U401.P9 U502.D8
FMC_D7 [MEM_DATA]: U401.R9 U502.E9
FMC_D8 [MEM_DATA]: U401.P10 U502.E1
FMC_D9 [MEM_DATA]: U401.R10 U502.D2
FMC_D10 [MEM_DATA]: U401.N11 U502.D1
FMC_D11 [MEM_DATA]: U401.P11 U502.C2
FMC_D12 [MEM_DATA]: U401.R11 U502.C1
FMC_D13 [MEM_DATA]: U401.P15 U502.B2
FMC_D14 [MEM_DATA]: U401.P14 U502.B1
FMC_D15 [MEM_DATA]: U401.N15 U502.A2
FMC_DQMH [MEM_DATA]: U401.A3 U502.F1
FMC_DQML [MEM_DATA]: U401.A4 U502.E8
FMC_RAS_L [MEM_ADDR_CNT]: U401.R6 U502.F8
FMC_WE [MEM_ADDR_CNT]: U401.J4 U502.F9
GND [POWER]: ANT201.2 ANT201.3 ANT202.GND ANT202.GND1 ANT202.GND2 C101.2 C102.2 C103.2 C104.2 C105.2 C201.2 C205.2 C206.2 C207.2 C214.2 C218.2 C222.2 C401.2 C402.2 C403.2 C404.2 C405.2 C406.2 C407.2 C408.2 C409.2 C410.2 C411.2 C412.2 C413.2 C414.2 C415.2 C416.2 C417.2 C418.2 C419.2 C420.2 C421.2 C422.2 C423.2 C424.2 C425.2 C501.2 C502.2 C503.2 C504.2 C505.2 C506.2 C507.2 C508.2 C601.2 C620.2 C701.2 C703.2 C704.2 C720.2 J301.4 J601.5 J701.5 J703.4 J703.6 J703.8 J703.10 J703.12 J703.14 J703.16 J703.18 J703.20 JP701.2 P101.2 Q103.2 R102.1 R105.1 R108.2 R206.2 R403.1 R603.1 R702.2 R704.2 S402.3 S402.4 U101.1 U102.2 U202.2 U203.49 U401.D5 U401.D7 U401.D8 U401.D9 U401.F2 U401.F6 U401.F7 U401.F8 U401.F9 U401.F10 U401.F12 U401.G2 U401.G6 U401.G7 U401.G8 U401.G9 U401.G10 U401.G12 U401.H6 U401.H7 U401.H8 U401.H9 U401.H10 U401.H12 U401.J6 U401.J7 U401.J8 U401.J9 U401.J10 U401.K6 U401.K7 U401.K8 U401.K9 U401.K10 U401.L4 U401.M1 U401.M8 U401.M9 U401.P1 U501.B3 U502.A1 U502.A3 U502.B7 U502.C3 U502.D7 U502.E3 U502.J1 U601.1 U601.TAB U701.2 U701.25 X401.2 X401.4 X701.6
I2C1_SCL [MEM_DATA]: J302.11 U401.B6
I2C1_SDA [MEM_DATA]: J302.12 U401.B5
JTCK: R706.1 TP401.1 U401.A14 X701.5
JTDI: R707.1 U401.A13 X701.3
JTDO: R708.1 U401.A10 X701.7
JTMS: R705.1 TP402.1 U401.A15 X701.4
PB0 [MEM_DATA]: J302.13 U401.R5
PB1 [MEM_DATA]: J302.10 U401.R4
PC6 [MEM_DATA]: J301.16 U401.H15
PC7 [MEM_DATA]: J302.14 U401.G15
PC9 [MEM_DATA]: J302.8 U401.F14
PE3 [MEM_DATA]: J302.4 U401.A1
PG3 [MEM_DATA]: J302.5 U401.K15
PH10 [MEM_DATA]: J302.9 U401.L13
POWER1:EN_3V3_L: Q102.1 Q103.3 R101.2
POWER1:N$1: R108.1 U102.5
POWER1:N$2: D101.1 U102.1
POWER1:N$3: D101.2 R103.2
POWER1:N$4: C105.1 Q102.3 U101.3
QUAD_SPI_IO0 [50ohm]: U401.N14 U501.D3
QUAD_SPI_IO1 [50ohm]: U401.N13 U501.D2
QUAD_SPI_IO2 [50ohm]: U401.A2 U501.C4
QUAD_SPI_IO3 [50ohm]: U401.M15 U501.D4
RESET_L [MEM_DATA]: J301.1 R401.1 S402.1 S402.2 U401.J1 X701.2
SPI2_CS_L: U203.34 U401.E14
SPI2_MISO: U203.38 U401.C14
SPI2_MOSI: U203.36 U401.C13
SPI2_SCK: U203.35 U401.D11
SPI3_CLK [MEM_DATA]: J301.11 U401.B14
SPI3_MISO [MEM_DATA]: J301.13 U401.B13
SPI3_MOSI [MEM_DATA]: J301.12 U401.A6
STM32_MCU1:BLINKY_B: R407.1 U401.N3
STM32_MCU1:BLINKY_G: R406.1 U401.N2
STM32_MCU1:BLINKY_R: R405.1 U401.P2
STM32_MCU1:BOOT: R403.2 S401.1 S401.2 U401.D6
STM32_MCU1:I2C2_SCL: U401.H4
STM32_MCU1:I2C2_SDA: U401.R13
STM32_MCU1:N$1: C401.1 U401.M10
STM32_MCU1:N$2: C402.1 U401.F13
STM32_MCU1:N$7: LED401.1 R405.2
STM32_MCU1:N$8: R402.1 U401.C6
STM32_MCU1:N$9: LED401.2 R406.2
STM32_MCU1:N$11: LED401.3 R407.2
STM32_MCU1:N$14: C425.1 R408.1 X401.3
STM32_MCU1:OSC_IN_PH0: C424.1 U401.G1 X401.1
STM32_MCU1:OSC_OUT_PH1: R408.2 U401.H1
STM32_MCU1:PC8_TIM8CH1: U401.G14
STM32_MCU1:PD5_BUT: U401.C11
UART4_RX [MEM_DATA]: J301.14 U401.D3
UART4_TX [MEM_DATA]: J301.15 U401.E12
UART5_ESP32: R712.1 TP207.1 U203.40 U401.P13 X702.3
USART1_RX [MEM_DATA]: J302.6 U401.R15 U701.21
USART1_TX [MEM_DATA]: J302.7 U401.R14 U701.20
USB_ID: R607.1 U401.D15
USB_N [USB]: R602.1 U401.C15
USB_OC: R606.1 U401.M4 U601.4
USB_OTG1:USB_ID: J601.4 R607.2
USB_OTG1:USB_N [USB]: J601.2 R602.2
USB_OTG1:USB_P [USB]: J601.3 R601.2
USB_P [USB]: R601.1 U401.B15
USB_PWR_ON: R603.2 U401.K12 U601.3
VBAT_MEAS: C222.1 R104.1 R105.2 U203.24

## Tracks (layer width: path | path; a pad name or v marks a point on that pad's centre or on a via)
+3V3  (via drill 0.2, 0.3, 0.35)
  Top 0.102: U401.C5
  Top 0.127: C501.1 20.71,52.81 v20.29,52.81 | U502.J9 v19.9,51.46 | U502.D3 25.3,47.46 v25.2,47.36 | U502.B3 25.35,45.48 v25.22,45.48 | U502.A7 23.04,44.55 v23.07,44.55 23.07,44.19 C505.1 | U502.C7 22.82,46.66 v23.12,46.36 | v23.29,48.17 23.16,48.05 22.79,48.05 22.78,48.06 22.73,48.06 U502.E7 | U401.K4 v25.75,29.85 v25.76,29.85 | v22.52,29.83 U401.F3 | U401.F3 | U401.J12 25.09,35.67 | U401.N9 v27.7,33.75
  Top 0.15: C414.1 C418.1 20.18,27.36 v20.18,27.76 | C414.1 20.88,27.36 U401.C1 | C414.1 21.38,27.34 v21.38,27.35 | R606.2 v24.89,55.99 v24.9,56
  Top 0.152: U401.G3 v23.17,29.21 v23.17,29.2 | 20.93,45.11 U502.A9 | U502.C7 22.53,46.68 | C421.1 v29.21,28.26 28.73,28.26 U401.R1 28.7,28.22 v29.19,27.72 v29.19,27.71 v29.2,27.72 C422.1 | R401.2 17.4,16 v17.41,15.99 | C502.1 19.24,48.15 v19.24,47.9 | R713.1 12.19,8.4 v12.22,8.37 | U401.N8 27.69,33.08 v27.69,33.1 | v27.07,34.38 U401.N10 v27.7,34.39 | U401.C5 v20.55,31.14 | U401.J13 v25.11,35.69 U401.J12 | U401.H13 v23.82,36.33 | v23.82,36.33 v23.81,36.32 23.51,36.02 U401.G13 23.51,36.02 v23.82,36.33 | v20.56,33.74 v20.56,33.73 U401.C9 v20.55,33.09 | v20.55,33.09 | U401.C7 v20.56,32.44 v20.56,32.45 U401.C8 v20.55,33.09
  Top 0.165: S401.4 34.59,11.42 v34.59,12.49 | S401.3 34.54,15.55 v34.54,16.49 | v23.13,20.82 | v23.13,20.82 U501.B4 | C503.1 19.25,47 v19.25,47.2 | v20.04,44.46 19.5,45 C504.1 19.5,45.06 U502.A9 | C507.1 29.02,47.18 v29.02,46.48 29.39,46.12 29.39,46.09 C506.1 | R707.2 v11.43,52.02 | R705.2 11.43,49.17 v11.48,49.23 | R706.2 11.43,46.56 v11.45,46.58 | R708.2 11.51,41.07 v11.51,41.73 | U701.5 U701.6 6.86,64.31 | R714.2 2.59,65.23 v2.57,65.25 | R205.2 v27.18,4.72 | R204.1 29.77,12.95 v30.23,12.95
  Top 0.2: LED401.4 32.35,7.15 v32.3,7.2
  Top 0.203: C704.1 5.97,64.14 v6.1,64.26 | U701.7 6.19,64.17 v6.1,64.26 | C701.1 v6.1,65.02 | 6.86,64.31 U701.6 6.86,64.31 | 6.86,64.31 6.53,64.64 | 6.53,64.64 6.15,65.02 v6.1,65.02 | 6.53,64.64 C703.1 6.51,65.44 v6.1,65.02 | v6.1,64.26 v6.1,65.02
  Top 0.254: U203.37 19.87,13.32 v19.76,13.21 | U203.46 19.65,8.82 C201.1 | C201.1 19.62,7.99 v19.56,7.92 | C201.1 19.62,9.54 v19.56,9.6 | U203.3 22.43,6.25 v22.46,6.22 | U203.4 22.93,6.35 v22.99,6.28
  Top 0.305: C102.1 19.96,64.41 19.71,64.16 U101.2 | U203.43 v19.92,10.32 v19.91,10.31 | U203.19 27.73,10.7 28.15,10.7 28.19,10.67 v28.4,10.67
  Top 0.406: U203.1 20.9,7.13 v20.73,6.96
  Bottom 0.127: C411.1 22.52,29.92 v22.52,29.83 22.52,29.93 C412.1 | C404.1 23.51,35.94 23.81,36.24 | C407.1 27.3,33.35 v27.7,33.75 | C415.1 26.83,34.38 v27.07,34.38 | C419.1 25.76,29.92 v25.76,29.85
  Bottom 0.15: C101.1 18.22,62.12 v18.1,62
  Bottom 0.152: R402.2 21.68,31.52 v21.93,31.76 | R709.1 11.44,11.7 v11.44,12.4 | R703.1 12.24,14.48 v12.27,14.45 | R701.1 11.86,21.79 v11.96,21.7 | v22.46,6.22 C207.1 v22.99,6.28 | C420.1 26.04,30.15 25.76,29.87 25.43,30.2 C419.1 | C403.1 27.63,33.1 v27.69,33.1 | 20.92,34 C413.1 20.66,33.74 v20.56,33.74 20.62,33.74 C408.1 20.65,33.09 20.57,33.09 | C406.1 U401.J13 v25.11,35.69 25.01,35.59 C417.1 | C416.1 20.82,31.12 20.75,31.12 20.73,31.14 v20.55,31.14 | C410.1 U401.C7 v20.56,32.45 20.64,32.45 C409.1 20.63,33.09 20.57,33.09 | 20.57,33.09 v20.55,33.09 | C404.1 23.81,36.25 v23.81,36.32
  Bottom 0.165: C508.1 v23.13,20.81 v23.13,20.82 | 23.81,36.24 C405.1 | C214.1 v19.76,13.21 | R202.1 25.39,16.31 v24.74,16.31
  other vias: 16.7,60 17.7,60 19.7,60 20.7,60 16.7,58 16.7,57 17.7,56 18.7,56 19.7,56 20.7,56 21.7,58 21.7,60 17.7,59 18.7,59 19.7,59 20.7,59 21.7,59 20.7,64 20.7,65 19.7,62 20.7,62
  pour Route14 (rank 3): -0.15,73.91 -0.15,0 38.1,0 38.1,73.91
  cutout Route14: 26.95,4.27 26.95,2.11 27.79,2.11 27.79,0.18 30.15,0.18 30.15,2.11 30.96,2.11 30.96,4.27
  pour Top (no thermals): 15.7,61 15.7,54 22.7,54 22.7,56 23.7,56 23.7,61
  pour Bottom: 16.7,60 16.7,55 21.7,55 21.7,60
  pour Top (no thermals): 18.7,62 21.7,62 21.7,65 18.7,65
+5V  (via drill 0.2, 0.3)
  Top 0.15: Q101.2 24.1,59.35
  Top 0.152: R101.1 14.28,64.16 14.64,64.16 Q102.2
  Top 0.165: R106.1 33.78,45.85 J302.3
  Top 0.254: v12.19,67.82 11.9,67.53 D701.1 | D701.1 11.9,66.59 v12.19,66.29 | D701.1 12.98,67.03 v13.21,66.8
  Top 0.305: v13,64.4 13.53,64.93 D601.1 13.53,65.83 v14.3,66.6 | v15.1,67.8 15.73,67.8 C601.1 15.87,67.69 U601.2 | 24.1,59.35 24.1,57.6 25.3,56.4 30.5,56.4 31.3,57.2 v33.9,57.2
  Top 0.406: 14.28,64.16 14.64,64.16 14.62,64.15 v14.62,64 | R101.1 13.15,64.25 v13,64.4
  pour Route14 (rank 2): 11.18,68.2 11.18,62.8 17.9,62.8 17.9,64.2 32.9,64.2 32.9,44.6 38.04,44.6 38.04,73.6 31.5,73.6 31.5,65.6 20.3,65.6 20.3,68.2
+VBAT  (via drill 0.3, 0.35)
  Top 0.165: R104.2 32.45,53.15 32.55,53.15 34.29,51.41 J302.1
  Top 0.254: v34.75,67.72 34.75,67.02 C104.1
  Top 0.406: U102.3 v33.4,67.75 33.86,67.75 | 25.15,58.42 25.89,57.67 P101.1 | Q101.3 25.15,59.38
  Top 0.61: P101.1 29.23,57.67 v30.02,58.47
  Top 0.813: 25.15,59.38 25.15,58.42
  Route3 0.406: v33.4,67.75 33.4,67.36
  Route3 0.508: 33.4,67.36 33.4,67.16 33.5,67.06 33.5,63.85
  Route3 0.61: 33.5,63.85 33.5,61.95 v30.02,58.47 v30.02,57 31.87,55.15 33.22,55.15 34.29,54.08 J302.1
  other vias: 32.36,68.63 34.75,68.63
  pour Top: 24.7,58.66 24.7,56.51 30.3,56.51 30.3,58.66
  pour Top (no thermals): 30.02,67.46 35.2,67.46 35.2,69.14 30.02,69.14
  pour Route3: 32.05,69.14 32.05,67.51 35.2,67.51 35.2,69.14
+VBUS  (via drill 0.2, 0.3)
  Top 0.127: v22.2,38.15 21.39,38.96 21.39,39.52 | 21.39,39.52 21.39,39.54 | 21.39,39.52 18.48,42.42 16.4,42.42 16.01,42.81 16.01,43.34 v16.52,43.86
  Top 0.15: U401.E15 22.2,37.34 v22.2,38.15 | C620.1 25.14,65.79 v25.14,66.29
  Top 0.2: Q101.1 | Q101.1 24.13,60 R102.2 | v23.7,60 24.13,60 Q101.1
  Top 0.254: U601.5 U601.6 19.33,68.76 v19.33,68.79 | v29.21,68.83 U102.4 27.62,67.75 v27.56,67.69 27.32,67.45 27.32,66.8 | 27.32,66.8 C103.1 27.8,66.69 28.32,66.17 28.32,65.02 29.84,63.5 R103.1 | 27.32,66.8 v26.42,66.8 | D601.2 13.53,68.89 v13.46,68.96
  Top 0.305: J601.1 25.44,69.5 v25.44,68.09 | J601.1 25.43,68.86 v26.19,68.1 | J601.1 v25.43,70.69
  Route3 0.127: 22.19,56.44 22.19,56.38
  Route3 0.152: v23.7,60 22.19,58.49 22.19,56.44 | v16.61,53.49 18.14,55.02 20.83,55.02 22.19,56.38
  Bottom 0.127: v16.52,43.86 16.52,53.41 v16.61,53.49
  Bottom 0.2: v25.14,66.29 24.7,65.86 24.7,61 v23.7,60
  pour Route14: 12.65,73.66 12.65,68.13 20.32,68.13 20.32,65.53 31.5,65.53 31.5,73.66
+VREF  (via drill 0.2)
  Top 0.102: U401.N1 27.37,28.2
  Top 0.127: v15.79,22.57 18.3,22.57 18.49,22.39 26.29,22.39 v27.38,23.48 | v16.26,56.1 16.17,56.01 15.9,56.01 | U401.N1 27.38,27.74 v27.47,27.65
  Top 0.152: 15.9,56.01 J301.3
  Bottom 0.127: v27.38,23.48 27.81,23.91 27.81,26.65 27.41,27.04 C423.1 27.38,27.56 v27.47,27.65 | v15.79,22.57 15.79,23.79 15.92,23.92 15.92,28.96 | 15.92,28.96 | v16.26,56.1 16.09,55.93 16.09,40.26 16.16,40.19 16.16,38.17 15.66,37.67 15.66,32.41 15.56,32.31 15.56,29.99 15.94,29.61 15.94,29.16 15.92,29.15 15.92,28.96
ADC1_IN3  (via drill 0.2)
  Top 0.152: U401.R2 30.34,28.87 30.57,28.63 31.13,28.63 31.35,28.41 31.35,28.12 v32.19,27.28
  Route3 0.152: 15.43,33.76 15.43,30.98 15.31,30.86 15.31,27.19 19.67,22.82 | J301.7 15.43,44.39 15.43,40.85 15.57,40.72
  Route3 0.165: 19.67,22.82 20.09,22.82 20.44,22.47 21,22.47 21.35,22.82 27.73,22.82 v32.19,27.28 | 15.57,40.72 15.77,40.51 15.85,40.51 16.16,40.19 16.16,39.75 15.85,39.44 15.85,38.94 15.43,38.52 15.43,36.58 15.43,33.76
ADC1_IN7  (via drill 0.2)
  Top 0.127: U401.R3 30.36,29.52
  Top 0.152: 30.36,29.52 30.4,29.56 30.75,29.56 31.51,28.8 31.51,28.73 31.88,28.36 31.94,28.36 v32.56,27.75
  Route3 0.127: 19.7,22.45 15,27.14
  Route3 0.152: 19.7,22.45 20.22,21.93 21.83,21.93 22.26,22.36 | J301.8 14.88,42.4 14.88,39.48 14.78,39.39 14.78,38.95 14.88,38.85 14.88,29.99 15,29.87 15,27.14
  Route3 0.165: v32.56,27.75 32.56,27.45 32.58,27.44 32.58,27.12 27.82,22.36 22.26,22.36
ADC1_IN10  (via drill 0.2)
  Top 0.127: 26.38,27.96 26.38,28.07 26.39,28.09 26.39,28.53 U401.M2
  Top 0.152: v26.32,26.67 26.32,27.48 26.32,27.49 26.32,27.8 26.38,27.86 26.38,27.96
  Top 0.165: 16.85,16.88 15.91,16.88 | 16.85,16.88 14.75,16.88 v14.66,16.8 | v26.66,16.09 25.85,16.09 25.07,16.88 16.85,16.88
  Bottom 0.127: 15.7,29.26 15.7,24.01 15.39,23.7 15.39,22.01 15.36,21.98 15.36,20.75 15.52,20.59
  Bottom 0.152: 26.66,23.4 26.66,23.41 26.66,24.27 26.74,24.35 26.74,24.67 26.66,24.75 26.66,26.33 | 15.15,29.81 15.32,29.64 | 15.32,29.64 15.7,29.26 | 15.15,29.81 15.32,29.64 | 15.15,30.12 | 15.15,30.12 15.15,30.02 | 15.15,30.02 15.15,29.81 | 13.97,39.55 15.15,38.37 15.15,30.12 | 15.15,30.02 15.15,30.12 | 15.15,30.12
  Bottom 0.165: 26.66,23.4 v26.66,16.09 | 13.97,39.55 J301.9 | v14.66,16.8 14.66,16.97 15.52,17.83 15.52,20.59 | v26.32,26.67 26.66,26.33
ADC1_IN11  (via drill 0.2)
  Top 0.127: v26.41,29.84 U401.M3
  Top 0.152: v23.17,21.91 15.01,21.91 v14.97,21.94
  Bottom 0.127: J301.10 13.97,37.34 | 15.15,22.11 v14.97,21.94
  Bottom 0.152: v26.41,29.84 26.41,27.89 26.32,27.8 26.32,27.2 25.94,26.83 25.94,25.58 23.17,22.81 v23.17,21.91 | 13.97,37.34 12.95,36.32 12.95,32.77 14.1,31.62 14.35,31.62 14.9,31.08 14.9,30.22 | 15.15,22.11 15.15,25 15.16,25.01 15.16,26.02 14.9,26.29 14.9,27.31 15.16,27.57 15.16,29.29 14.83,29.62 14.83,30.16 14.9,30.22 | 14.9,30.22 14.88,30.21
BLINKY  (via drill 0.2)
  Top 0.152: v1.13,12.68 1.28,12.83 11.55,12.83 11.82,12.56 D702.1
  Top 0.165: U203.39 19.98,12.32 19.87,12.43 18.12,12.43 16.2,10.52 13.16,10.52 12.7,10.97 12.7,11.89 12.4,12.18 D702.1
  Bottom 0.152: v1.13,12.68 1.13,14.88 3.81,17.56 3.81,28.95 2.02,30.73 2.02,40.29 2.54,40.81 X702.1
CAN1_RX  (via drill 0.2)
  Top 0.127: U401.A5 18.62,30.82
  Top 0.165: v16.58,31.42 17.25,31.42 17.59,31.08 18.35,31.08 18.62,30.82 | v17.09,20.3 16.94,20.45 J301.17
  Bottom 0.127: v17.1,20.31 17.1,22.89 17.09,22.89 17.09,23.2 17.1,23.21 17.1,26.62
  Bottom 0.152: v16.58,31.42 17.03,30.97 17.03,26.69 17.1,26.62
  Bottom 0.165: v17.1,20.31 v17.09,20.3
CAN1_TX  (via drill 0.2)
  Top 0.127: U401.B4 20.2,30.17 19.9,29.87 19.72,29.87 19.71,29.85 19.45,29.85 19.44,29.87 18.86,29.87
  Top 0.152: 17.6,29.26 17.94,29.6 18.27,29.6 18.54,29.87 18.86,29.87
  Top 0.165: v14.08,29.31 14.14,29.26 17.6,29.26
  Bottom 0.127: J301.18 12.99,18.89 12.99,23.32 14.28,24.61 14.35,24.61 14.85,25.11 14.9,25.11
  Bottom 0.152: 14.9,28.35 14.9,28.5 v14.08,29.31
  Bottom 0.165: 14.9,25.11 14.9,25.91 14.64,26.18 14.64,27.42 14.9,27.68 14.9,28.35
DAC_OUT1  (via drill 0.2)
  Top 0.127: J301.5 15.97,50.93 17.18,52.14 | v32.09,48.78 28,52.86 24.13,52.86 | U401.N4 v27.7,29.84 v27.71,29.84
  Top 0.152: 17.18,52.14 21,52.14 21.71,52.85 22.42,52.85 22.43,52.86 24.13,52.86
  Route3 0.152: v32.14,29 31.29,29 30.72,29.56 27.99,29.56 v27.71,29.84
  Bottom 0.127: 32.48,37.18 32.75,36.91 32.75,36.33 32.91,36.17 32.91,36.02 32.91,35.86 32.79,35.74 32.79,32.15
  Bottom 0.152: v32.09,48.78 32.09,37.57 32.48,37.18 | 32.79,32.15 32.71,32.08 32.71,31 31.79,30.07 31.79,29.48 32.14,29.13 v32.14,29
DAC_OUT2  (via drill 0.2)
  Top 0.127: 32.21,28.62 32.71,28.11 32.72,28.11 33.03,27.8 33.03,27.44 | U401.P4 28.35,29.85 30.06,29.85
  Top 0.15: 29.95,29.85 30.06,29.85 31.48,29.85 31.79,29.54 31.79,29.18 31.76,29.15 31.76,28.84 31.98,28.62 32.21,28.62 | 33.03,27.44 32.67,27.08 v32.67,26.28
  Route3 0.152: 12.96,46.52 12.83,46.38 12.83,25.38 12.96,25.25
  Route3 0.165: J301.6 13.97,47.53 12.96,46.52 | 12.96,25.25 14.34,23.87 17.35,23.87 18.25,22.97 18.25,22.59 19.38,21.47 27.86,21.47 28.65,22.26 31.73,22.26 32.94,23.46 32.94,26.02 v32.67,26.28
DEBUG1:+VBUS_UART  (via drill 0.2)
  Top 0.152: v9.85,65.05 9.85,65.81 9.87,65.83
  Top 0.165: U701.8 4.97,63.11 v4.88,63.02
  Top 0.406: J701.1 9.68,67.17 D701.2 9.54,66.16 9.87,65.83 C720.1
  Bottom 0.152: v4.88,63.02 5.33,63.48 8.74,63.48 9.85,64.59 v9.85,65.05
DEBUG1:D_N  (via drill 0.2)
  Top 0.165: U701.4 7.88,64.89 7.29,65.48 v7.29,65.84 | J701.2 9.03,68.68 8.25,67.9 8.25,66.05 v8.47,65.82
  Bottom 0.165: v7.29,65.84 8.46,65.84 v8.47,65.82
DEBUG1:D_P
  Top 0.165: 8.37,64.29 U701.3 8.38,65.03 8.38,65.02 8.38,65.07 7.83,65.62 7.83,68.07 8.38,68.62 J701.3
DEBUG1:DTR  (via drill 0.2)
  Top 0.152: U701.15 v7.88,59.58 | Q702.2 2.49,36.42 v2.51,36.44
  Bottom 0.152: v7.88,59.58 7.88,58.91 5.97,57 5.97,39.64 6.12,39.49 6.12,38.88 5.84,38.61 5.67,38.61 | R710.2 5.67,38.61 | v2.51,36.44 4.68,38.61 5.67,38.61
DEBUG1:N$1  (via drill 0.2)
  Top 0.152: Q701.3 5.09,39.81 v5.15,39.81
  Bottom 0.152: v5.15,39.81 5.61,39.35 R710.1
DEBUG1:N$2  (via drill 0.2)
  Top 0.152: Q702.3 2.48,37.6 v2.48,38.39
  Bottom 0.152: R711.1 3.16,38.39 v2.48,38.39
DEBUG1:N$5
  Top 0.152: D702.2 R713.2
DEBUG1:RTS  (via drill 0.2)
  Top 0.152: U701.11 4.51,61.61 v4.49,61.58 | v4.49,41.88 4.49,41.14 Q701.2
  Bottom 0.152: v4.49,61.58 v4.49,41.88 4.49,40.23 R711.2
DEBUG1:UART_RESET_L
  Top 0.165: U701.9 2.59,62.61 | 2.59,62.61 JP701.1 | R714.1 2.59,62.61
DEBUG1:USB1_UART_TX_X
  Top 0.152: U701.13 6.88,59.02 R712.2
EN_3V3
  Top 0.165: R106.2 33.53,47.63 J302.2 30.92,51.75 30.84,51.84 Q103.1
ESP32:CHIP_ANT_50OHM
  Top 0.15: C205.1 22.23,2.14
  Top 0.152: 22.23,2.14 21.4,2.14 C220.1 | 23.18,2.14 arc-90 L201.2
  Top 0.165: C205.1 22.21,2.03 L201.2
ESP32:EXTANT_50OHM
  Top 0.152: ANT202.SIG 15.64,5.46 15.98,5.46 arc-90 C219.1
ESP32:FLASH_VDD  (via drill 0.2)
  Top 0.165: U203.26 26.42,14.01 26.42,14.48 v26.11,14.78
  Bottom 0.165: v26.11,14.78 25.75,15.14 25.56,15.14
  Bottom 0.2: 25.56,15.14 R202.2
ESP32:GPIO2
  Top 0.165: U203.22 29.2,12.32 R206.1
ESP32:GPIO26  (via drill 0.2)
  Top 0.152: v18.92,4.83 19.35,4.83 19.53,4.64
  Top 0.165: 19.53,4.64 U202.6 | U203.15 28.11,8.82 28.4,8.53 v28.4,7.77
  Route3 0.152: v18.92,4.83 18.92,5.24 18.92,5.56 18.92,5.84 21.31,8.23 21.53,8.46 22.23,8.46 23.42,7.26
  Route3 0.165: 23.42,7.26 23.72,7.26 26.75,7.26 27.25,7.77 v28.4,7.77
ESP32:GPIO27  (via drill 0.2)
  Top 0.152: v22.05,4.7 20.91,4.7 arc90 U202.4
  Top 0.165: U203.16 27.63,9.3 28.15,9.3 28.85,8.6 v28.85,8.38
  Route3 0.165: v22.05,4.7 22.94,5.59 23.96,5.59 24.01,5.54 25.65,5.54 27.2,7.09 28.27,7.09 28.85,7.67 v28.85,8.38
ESP32:LNA_50OHM
  Top 0.165: C221.2 arc90 21.95,6.77 21.93,6.79 U203.2
ESP32:N$3
  Top 0.152: U203.8 C203.2
ESP32:N$4
  Top 0.152: C202.1 23.43,5.92 U203.5
ESP32:N$5
  Top 0.152: U203.6 23.93,5.92 C202.2
ESP32:N$7
  Top 0.152: U203.7 C203.1
ESP32:N$8
  Top 0.152: C206.1 25.27,1.89 | 25.27,1.89 26.27,1.89 arc-90 ANT201.1 | L201.1 25.13,2.03 arc-90 25.27,1.89
ESP32:N$10
  Top 0.165: U203.41 19.82,11.32 R203.1
ESP32:N$13
  Top 0.152: U202.3 20.84,2.2 arc90 C220.2
ESP32:N$14
  Top 0.152: C219.2 19.53,2.92 arc90 U202.1
ESP32:N$15
  Top 0.152: C221.1 U202.5 arc-90 U202.5
ESP32_BOOT_L  (via drill 0.2)
  Top 0.127: U401.E3 v21.86,29.2
  Top 0.152: Q702.1 6.65,36.63 v6.69,36.59 | v6.47,50.9 6.37,50.8 X702.4
  Top 0.165: U203.23 28.38,12.82 | 28.38,12.82 v28.4,12.8 | R204.2 28.82,12.82 28.38,12.82
  Route3 0.152: v24.2,15.49 23.64,14.94 22.23,14.94 21.7,15.47 21.56,15.47 17.78,19.25 12.39,19.25 9.96,21.69 9.96,32.72 6.69,35.98 v6.69,36.59
  Bottom 0.127: 22.12,28.95 v21.86,29.2
  Bottom 0.152: 22.47,27.51 22.47,28.03 22.12,28.38 22.12,28.95 | v6.69,36.59 6.69,50.68 v6.47,50.9 | TP202.1 v24.2,15.49 | 24.97,14.31 26.56,12.72 26.67,12.72
  Bottom 0.165: 22.47,27.51 22.47,17.22 v24.2,15.49 | v28.4,12.8 28.31,12.72 26.67,12.72 26.56,12.72 | TP202.1 24.97,14.91 24.97,14.31
ESP32_MTCK  (via drill 0.2)
  Top 0.165: v28.4,11.28 28.36,11.32 U203.20
  Route3 0.15: 22.96,10.21 22.12,11.05 21.53,11.05 21.31,10.82 19.25,10.82 18.64,10.21
  Route3 0.165: 18.64,10.21 17.73,10.21 TP201.1 15.9,10.67 14.07,12.5 14.07,13.26 12.09,15.24 10.87,15.24 v10.57,15.54 | 22.96,10.21 25.5,10.21 26.57,11.28 v28.4,11.28
  Bottom 0.152: R702.1 7.92,16.56 J703.9
  Bottom 0.165: R702.1 10.42,15.69 v10.57,15.54
  other vias: 17.27,10.67
ESP32_MTDI  (via drill 0.2)
  Top 0.152: v29.26,6.88 29.26,7.55 | 10.56,7.62 v10.54,7.64 10.56,7.62
  Top 0.165: 29.26,7.55 29.26,9.35 28.33,10.28 28.24,10.28 28.2,10.32 U203.18
  Route3 0.152: v29.26,6.88 29.26,5.92 28.57,5.23 26.29,5.23 25.78,4.72 25.78,4.64 25.08,3.94 23.72,3.94 22.75,2.97 18.8,2.97 18.49,3.28 18.49,6.5 16.51,8.48 v16.51,9.6 15.16,8.26 14.95,8.26 14.35,7.64 v10.54,7.64
  Bottom 0.152: v10.54,7.64 10.54,8.87 | J703.5 7.72,11.68 R709.2 R704.1
  Bottom 0.165: TP203.1 16.97,9.14 v16.51,9.6 | 10.54,8.87 10.54,10.45 R704.1
ESP32_MTDO  (via drill 0.2)
  Top 0.152: J703.13 10.16,19.41 10.16,18.31 10.68,17.79
  Top 0.165: U203.21 28.33,11.82 v28.4,11.89 | TP204.1 15.9,13.56 13.16,13.56 12.85,13.87 12.85,16.76 11.82,17.79 10.68,17.79
  Route3 0.165: v28.4,11.89 26.05,11.89 25.81,11.65 21.3,11.65 20.93,11.28 19.56,11.28 18.64,12.19 TP204.1
  Bottom 0.152: R701.2 7.77,21.79 J703.13
  other vias: 17.27,12.19
ESP32_MTMS  (via drill 0.2)
  Top 0.165: U203.17 27.67,9.75 28.24,9.75 v28.4,9.6 | v14.53,12.95 14.22,13.26 8.69,13.26 J703.7
  Route3 0.165: v28.4,9.6 26.35,9.6 25.66,8.91 19.32,8.91 v18.19,7.77
  Bottom 0.152: J703.7 10.19,14.25 R703.2
  Bottom 0.165: v18.19,7.77 18.03,7.62 TP205.1 14.53,10.11 v14.53,12.95
ESP32_RESET_L  (via drill 0.2)
  Top 0.102: U401.K1
  Top 0.15: C218.1 R205.1 27.18,6.4 v27.2,6.42 | v26.36,24.51 26.38,24.53 26.38,25.36 25.53,26.21 25.53,26.94 25.37,27.09 25.37,27.41 25.43,27.46 U401.K1
  Top 0.152: Q701.1 v0.91,40.08 | v0.91,40.08 | v0.76,53.37 2.51,53.37 X702.5 | J703.3 7.53,9.17 6.27,7.92 0.76,7.92 v0.75,7.9
  Top 0.165: U203.9 25.43,6.32 25.91,5.84 C218.1
  Bottom 0.15: 27.71,6.93 v27.2,6.42
  Bottom 0.152: v26.36,24.51 26.36,16.34 26.27,16.25 26.27,15.45 | v27.2,6.42 27.2,6.06 25.08,3.94 23.72,3.94 22.73,2.95 19.61,2.95 17.42,5.13 15.04,5.13 13.64,6.53 10.26,6.53 9.91,6.88 9.91,6.96 J703.3 | v0.76,53.37 0.76,40.23 v0.91,40.08 0.75,39.92 0.75,12.52 | v0.75,7.9 0.75,12.52 | 0.75,12.52 | TP206.1 | TP206.1 26.83,14.89 | 28.85,9.65 28.85,8.93 27.79,7.87
  Bottom 0.165: 26.27,15.45 26.83,14.89 28.53,13.19 28.56,13.19 28.85,12.89 28.85,9.65 | 27.79,7.87 27.71,7.79 27.71,6.93
ESP32_UART5  (via drill 0.2)
  Top 0.102: 21.15,37.73 21.19,37.68
  Top 0.127: 21.19,35.77 21.19,36.83 21.19,36.97 | 21.19,36.97 21.2,36.98 21.19,36.97 | 21.19,37.68 21.19,37.34 21.19,36.97
  Top 0.15: 21.09,38.93 21.09,37.78 21.15,37.73
  Top 0.152: v16.97,41.69 18.33,41.69 21.09,38.93 | U701.12 3.92,61.11 v3.9,61.09
  Top 0.165: U401.D12 21.19,35.7 21.19,35.77 | R203.2 19.2,11.43 v18.49,11.43
  Route3 0.152: v19.05,15.11 15.47,15.11 10.21,20.37 v3.2,20.37
  Bottom 0.127: 16.51,21.86 16.51,17.61 | v16.97,41.69 16.97,36.59 16.58,36.2
  Bottom 0.152: 16.51,17.61 19.05,15.07 TP208.1 v19.05,15.11 | v3.9,61.09 3.9,60.6 4.06,60.44 4.06,47.24 X702.2 1.61,44.79 1.61,42.8 1.63,42.78 1.63,21.95 v3.2,20.37 | 16.26,31.19 16.75,30.7 16.75,30.23 16.75,30.02 | 16.26,31.64 16.26,35.88 16.58,36.2
  Bottom 0.165: 16.26,31.64 16.2,31.58 16.2,31.26 16.26,31.19 | 16.51,21.86 16.75,22.1 16.75,28.55 16.75,30.02 | v18.49,11.43 18.49,12.41 17.8,13.1 17.8,13.99 TP208.1
FLASH_CLK  (via drill 0.2)
  Top 0.152: v28.56,20.63 27.65,20.63 26.8,19.77 23.94,19.77 23.59,19.42 23.59,18.73 23.17,18.3 U501.B2 | U401.M6 v27.05,31.14
  Bottom 0.127: v27.05,31.14 27.24,30.95
  Bottom 0.152: 27.24,30.95 28.19,30 28.19,28.75 | 28.19,28.75 28.19,28.29 | 28.19,28.29 28.27,28.2 | 28.27,28.2 28.5,27.98 | 28.5,27.98 28.6,27.88 28.6,20.67 v28.56,20.63 | 28.27,28.2 28.2,28.28 | 28.19,28.75 28.19,28.29 | 28.19,28.29 28.5,27.98
FLASH_CS_L  (via drill 0.2)
  Top 0.15: U401.R12 29.39,35.37